# Altium PCB BD2_yd_V1.0.PcbDoc
Units mm, origin at the board's own origin, x right, y up, seen from the top; angles counter-clockwise.
Board outline 136.1 x 133.6 mm, 4 copper layers (Top Layer, Signal Layer 1, Signal Layer 2, Bottom Layer), stack 0.778 mm thick; 150 components, 91 nets, 496 pads, 199 vias.
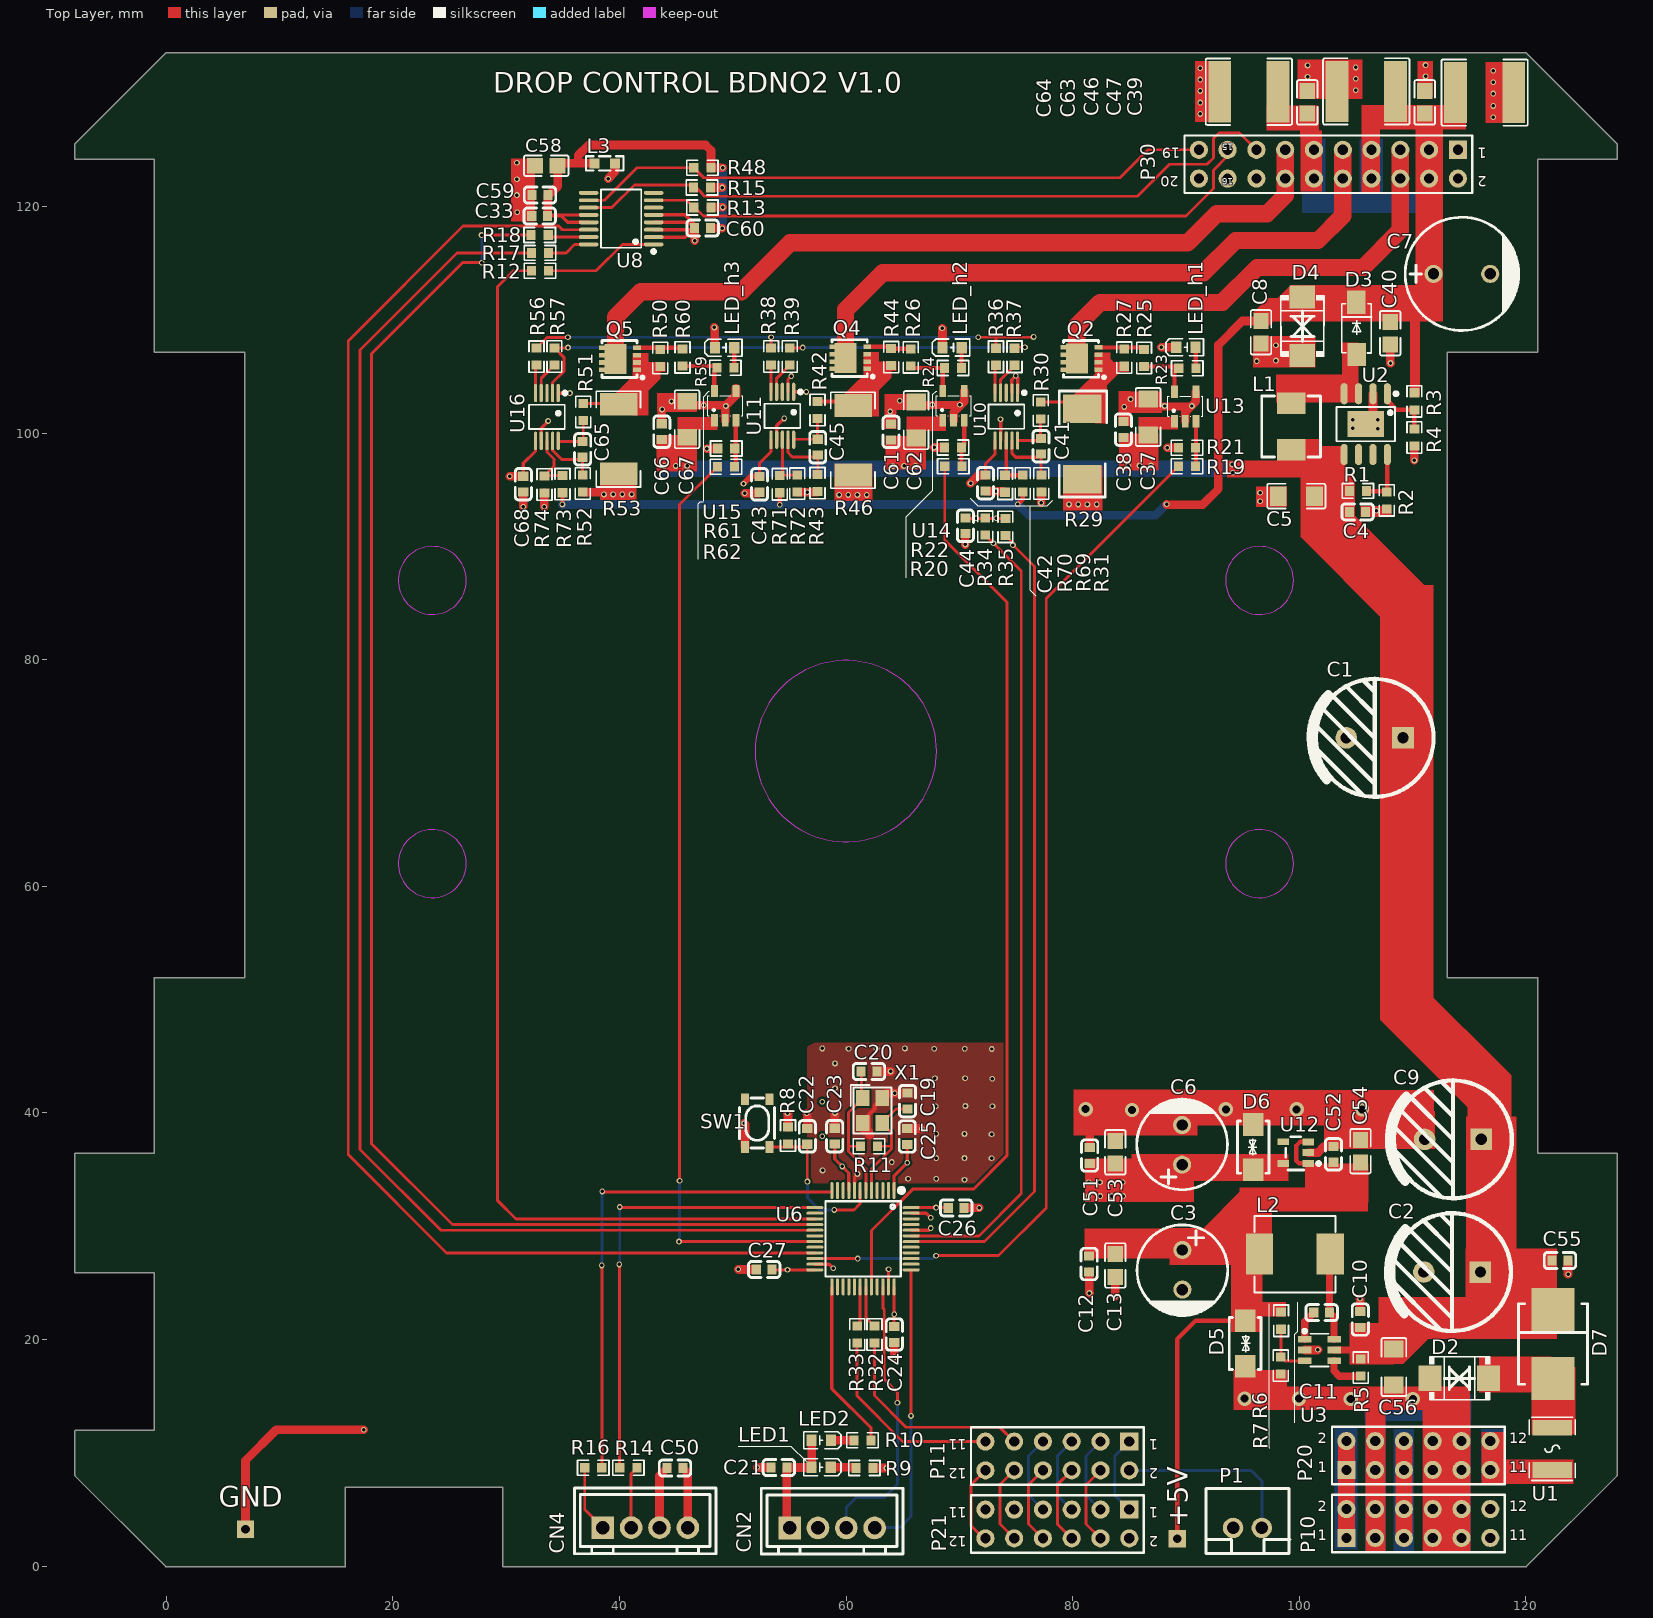
[diagram p0: Top Layer view]
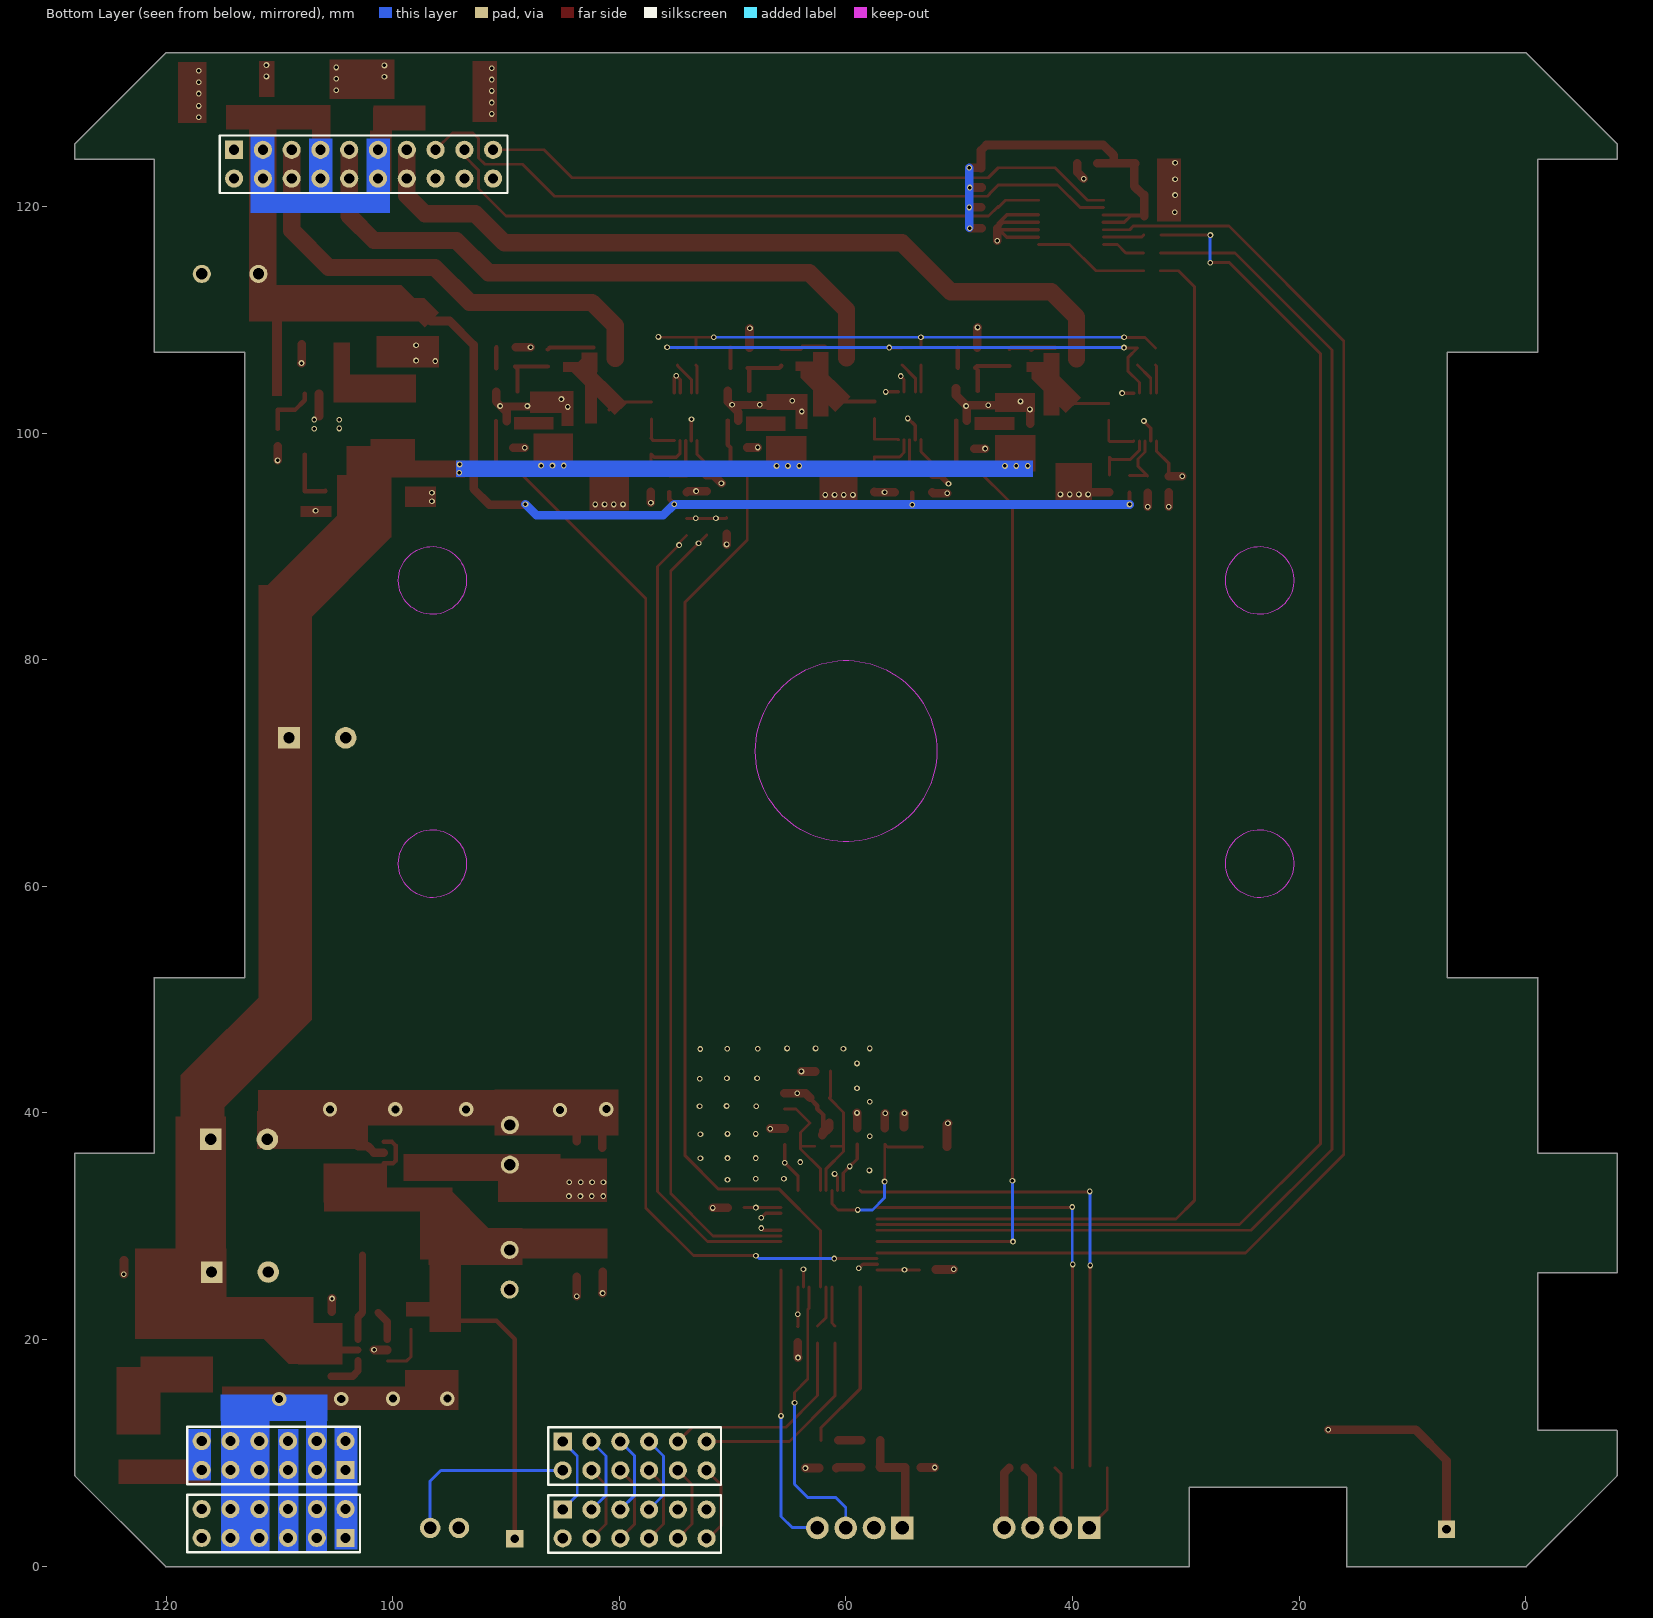
[diagram p1: Bottom Layer view, seen from below]
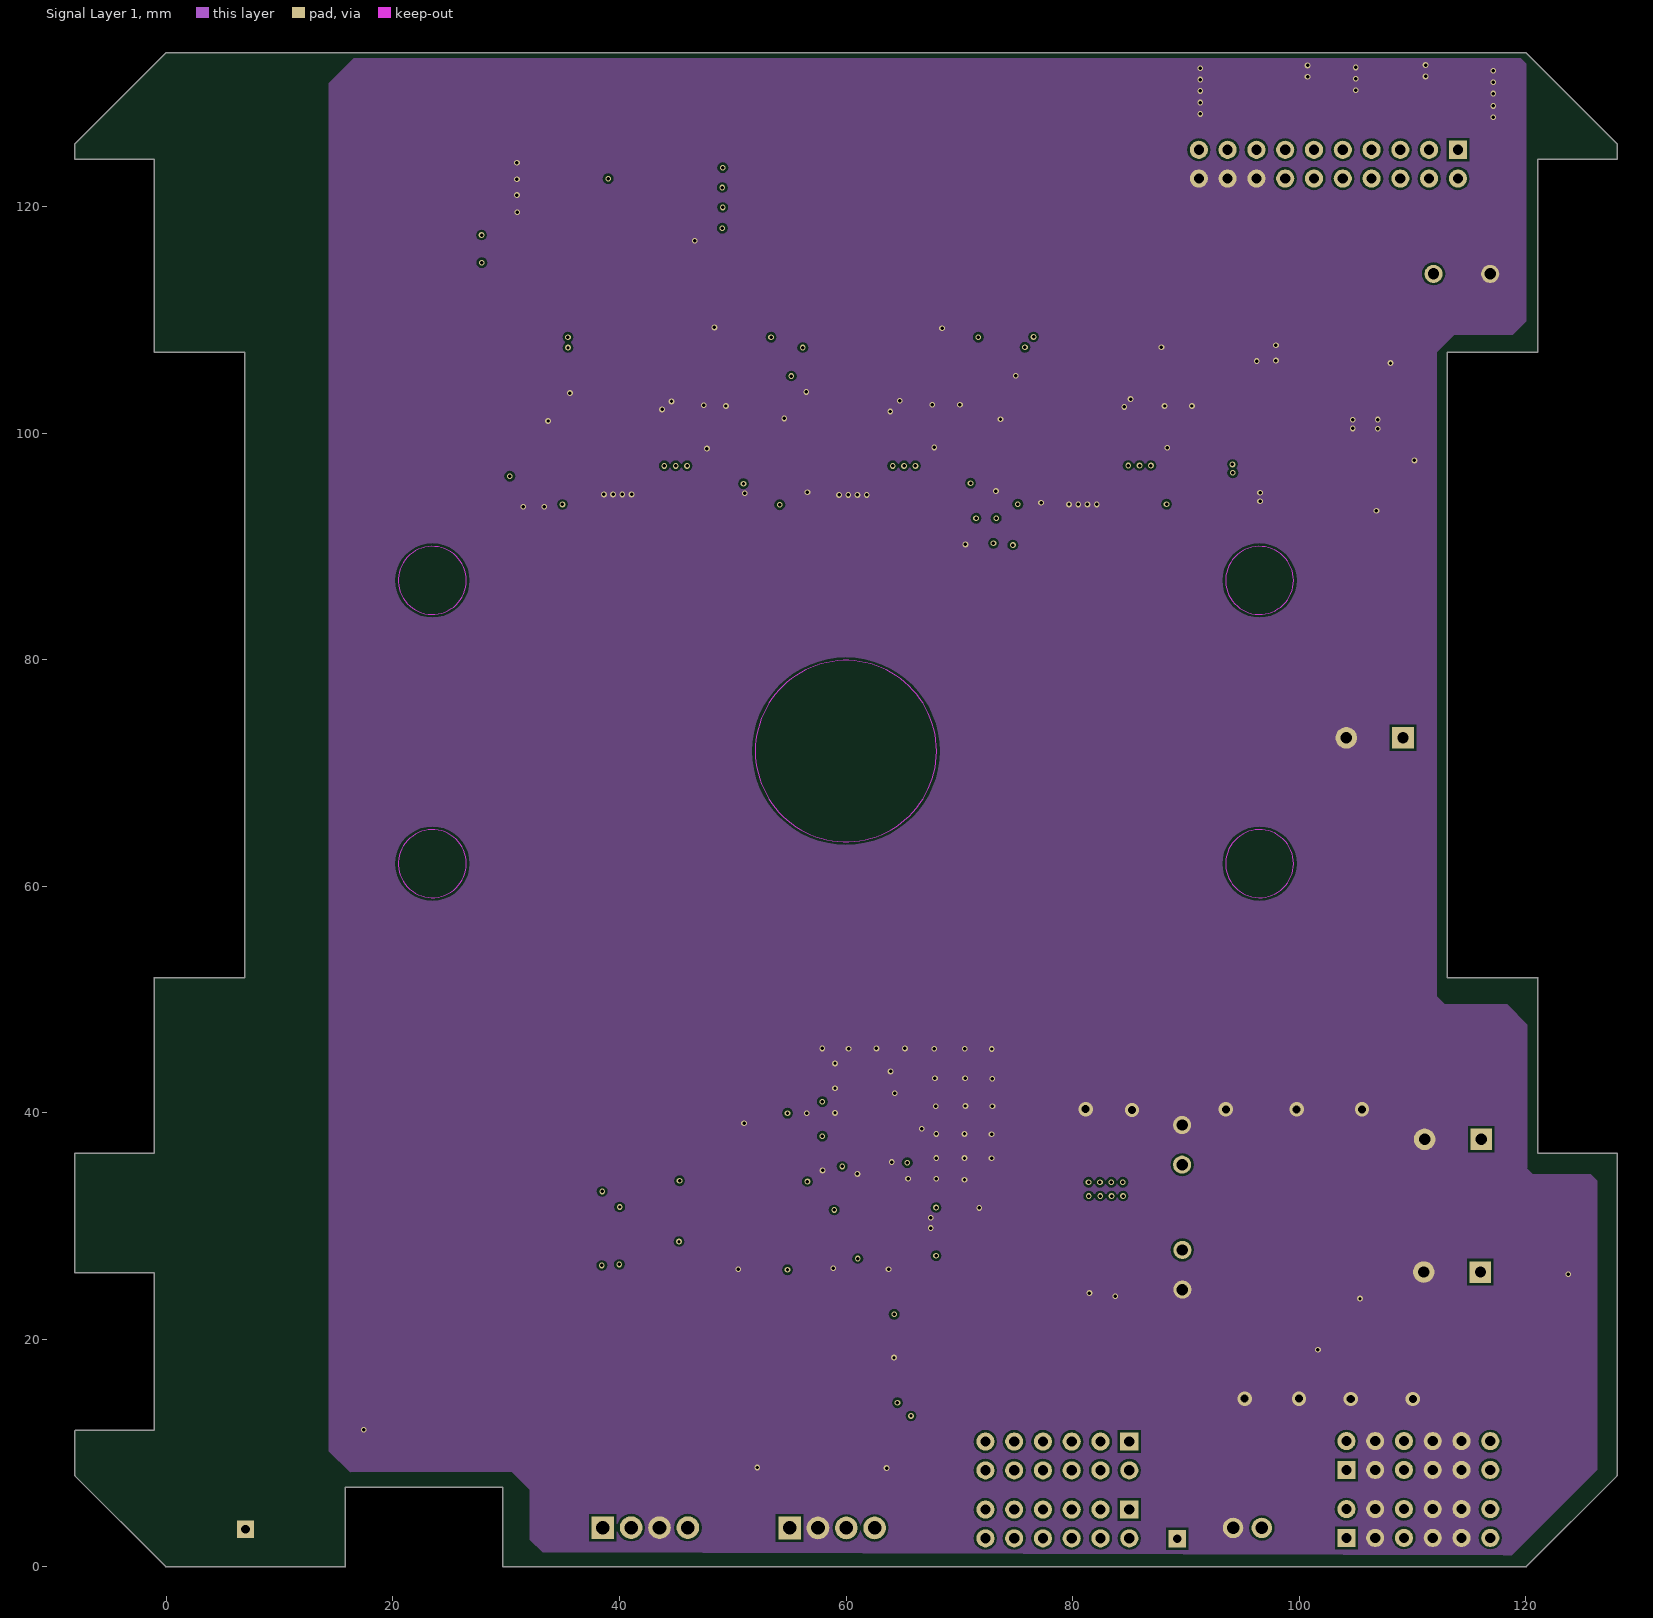
[diagram p2: Signal Layer 1]
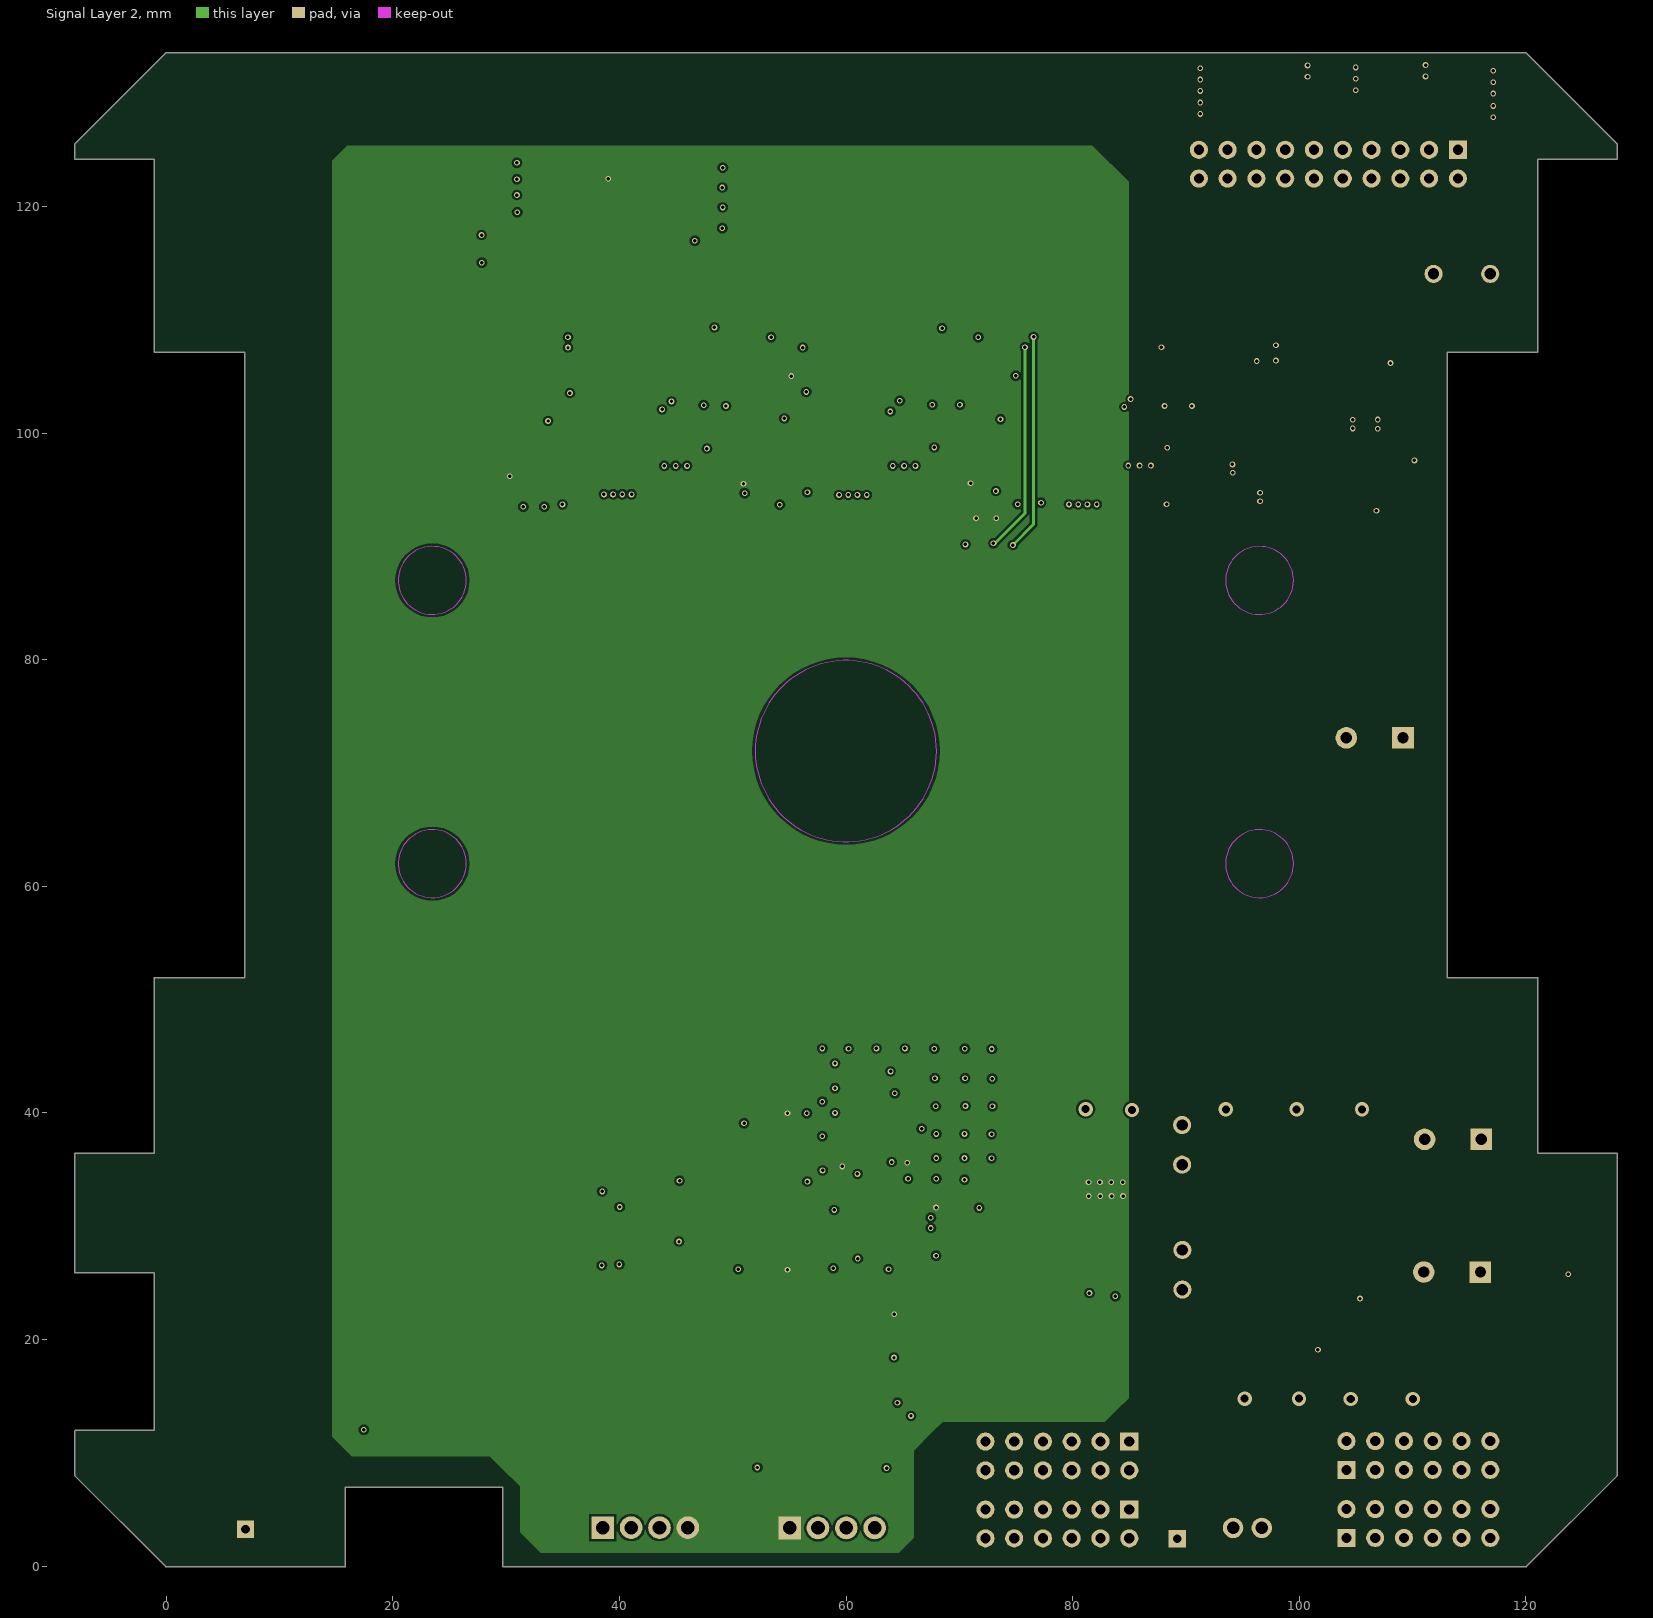
[diagram p3: Signal Layer 2]

## Layer stack, top to bottom
Top Layer: signal copper 0.0356
Dielectric: core 0.254, FR-4, Dk 4.2
Signal Layer 1: signal copper 0.036
Dielectric: prepreg 0.127, Dk 4.2
Signal Layer 2: signal copper 0.036
Dielectric: core 0.254, Dk 4.2
Bottom Layer: signal copper 0.0356

## Board outline
-8.05,8 ccw(c-8,8) -8.035,7.964 -0.036,-0.035 -0.036,-0.036 -0.036,-0.035 ccw(c0,0) 0,-0.05 15.773,-0.05 ccw(c15.773,0) 15.809,-0.036 ccw(c15.773,0) 15.824,0 15.824,6.95 29.723,6.95 29.723,0 ccw(c29.773,0) 29.773,-0.05 119.999,-0.05 ccw(c120,0) 120.036,-0.035 120.036,-0.036 128.036,7.964 128.035,7.964 ccw(c128,8) 128.05,8 128.05,36.4 ccw(c128,36.4) 128,36.45 121.05,36.45 121.05,51.9 ccw(c121,51.9) 121,51.95 113.05,51.95 113.05,107.15 121,107.15 ccw(c121,107.2) 121.05,107.2 121.05,124.15 128,124.15 ccw(c128,124.2) 128.05,124.2 128.05,125.5 ccw(c128,125.5) 128.035,125.536 128.036,125.536 120.036,133.536 120.036,133.535 ccw(c120,133.5) 120,133.55 0,133.55 ccw(c0,133.5) -0.036,133.535 -0.036,133.536 -0.036,133.535 -8.035,125.536 -8.036,125.536 -8.035,125.536 ccw(c-8,125.5) -8.05,125.5 -8.05,124.2 ccw(c-8,124.2) -8,124.15 -1.05,124.15 -1.05,107.2 ccw(c-1,107.2) -1,107.15 6.95,107.15 6.95,51.95 -1,51.95 ccw(c-1,51.9) -1.05,51.9 -1.05,36.45 -8,36.45 ccw(c-8,36.4) -8.05,36.4 -8.05,25.934 ccw(c-8,25.933) -8,25.883 -1.05,25.883 -1.05,11.984 -8,11.984 ccw(c-8,11.933) -8.05,11.933

## Design rules (kind name [scope] priority, off if disabled: settings)
Clearance Clearance_2 [InComponent('U4')] p1: gap=0.178
Clearance Clearance_4 [InComponent('U11')] p2: gap=0.178
Clearance Clearance_1 [InComponent('USB1')] p3: gap=0.152
Clearance Clearance_3 [InNetClass('HV Class')] p4: gap=0.7
Clearance [All] p5: gap=0.203
HoleSize [All] p1: absolutevalues=TRUE maxlimit=2539.975 minlimit=0.025 maxpercent=80.000 minpercent=20.000
MinimumSolderMaskSliver [All] p1: minsoldermaskwidth=0
PlaneConnect [InPadClass('All Pads')] p1: planeconnectstyle=Direct reliefexpansion=0.508 reliefentries=4 reliefconductorwidth=0.254 reliefairgap=0.254
PolygonConnect PolygonConnect_2 [IsVia] p1: connectstyle=Direct reliefconductorwidth=0.254 reliefentries=4 polygonreliefangle="90 Angle" airgapwidth=0.254
PolygonConnect PolygonConnect_1 [All vs InNet('GND')] p2: connectstyle=Direct reliefconductorwidth=0.254 reliefentries=4 polygonreliefangle="90 Angle" airgapwidth=0.254
PolygonConnect [All] p3: connectstyle=Direct reliefconductorwidth=0.254 reliefentries=4 polygonreliefangle="90 Angle" airgapwidth=0.254
RoutingVias RoutingVias_1 [All] p1: holewidth=0.305 width=0.508 viastyle="Through Hole" minholewidth=0.305 minwidth=0.508 maxholewidth=0.305 maxwidth=0.508
RoutingVias [All] p2: holewidth=0.305 width=2.54 viastyle="Through Hole" minholewidth=0.508 minwidth=2.54 maxholewidth=1.27 maxwidth=2.54
SilkToSilkClearance [All] p1: silktosilkclearance=0
SilkToSolderMaskClearance [IsPad] p1: minsilkscreentomaskgap=0 clearancetoexposedcopper=TRUE
SolderMaskExpansion [All] p1: expansion=0.102
Width [All] p1: maxlimit=5.08 minlimit=0.152 preferedwidth=0.254 minimp=50.000000 maximp=50.000000 favimp=50.000000
23 further rules are at their usual default settings.

## Classes and differential pairs
component class Connect: P1 P10 P11 P20 P21 P30

## Components (designator, comment, footprint, x,y, rotation, side; value= is the part's Value field where it differs from the comment)
C1 "220UF/50V" "CAP 5.0*10*12.5" 106.655,73.101 r180 top
C2 "220UF/50V" "CAP 5.0*10*12.5" 113.487,25.959 r180 top
C3 "470uF /16V" CAP-TH_BD8.0-P3.50-D0.6-FD 89.687,26.162 r270 top
C4 "100nF" C0603 105.15,93.044 r180 top
C5 "10uF" C1206 99.746,94.437 r0 top
C6 "470uF /16V" CAP-TH_BD8.0-P3.50-D0.6-FD 89.662,37.186 r90 top
C7 "220uF" CAP-TH_BD10.0-P5.00-D0.6-FD-A 114.351,114.046 r0 top
C8 "100nF" C0805 96.622,108.89 r90 top
C9 "220UF/50V" "CAP 5.0*10*12.5" 113.563,37.668 r180 top
C10 "100nF" C0603 105.385,21.768 r90 top
C11 "100nF" C0603 101.981,22.377 r180 top
C12 "100nF" C0603 81.458,26.67 r270 top
C13 "22uF" C0805 83.769,26.543 r90 top
C19 "20pF" C0603 65.43,41.046 r270 top
C20 "20pF" C0603 62.027,43.663 r180 top
C21 "100nF" C0603 54.077,8.712 r0 top
C22 "100nF" C0603 56.585,37.94 r90 top
C23 "100nF" C0603 59.004,37.948 r90 top
C24 "100nF" C0603 64.262,20.447 r270 top
C25 "100nF" C0603 65.405,37.922 r90 top
C26 "100nF" C0603 69.723,31.623 r0 top
C27 "100nF" C0603 52.781,26.187 r180 top
C33 "100nF" C0603 32.969,119.151 r0 top
C37 "10uF" C1206 86.665,101.422 r270 top
C38 "100nF" C0603 84.48,100.305 r270 top
C39 "10uF" C2220 116.357,130.048 r0 top
C40 "100nF" C0805 108.026,108.814 r90 top
C41 "100nF" C0603 77.203,98.835 r270 top
C42 "100nF" C0603 72.314,95.58 r270 top
C43 "100nF" C0603 52.375,95.479 r90 top
C44 "100nF" C0603 70.536,91.821 r270 top
C45 "100nF" C0603 57.506,98.755 r270 top
C46 "10uF" C2220 105.918,130.15 r180 top
C47 "100nF" C0805 111.074,129.184 r270 top
C50 "100nF" C0603 44.907,8.661 r180 top
C51 "100nF" C0603 81.509,36.246 r90 top
C52 "100nF" C0603 103.022,36.347 r90 top
C53 "22uF" C0805 83.769,36.525 r270 top
C54 "22uF" C0805 105.41,36.627 r270 top
C55 "100nF" C0603 123.012,26.975 r180 top
C56 "10uF" C1206 108.356,17.577 r90 top
C58 "22uF" C0805 33.553,123.596 r0 top
C59 "100nF" C0603 32.995,121.006 r180 top
C60 "100nF" C0603 47.346,118.085 r180 top
C61 "100nF" C0603 63.983,100.101 r270 top
C62 "10uF" C1206 66.192,101.143 r270 top
C63 "100nF" C0805 100.711,129.184 r270 top
C64 "10uF" C2220 95.555,130.124 r180 top
C65 "100nF" C0603 36.759,98.567 r270 top
C66 "100nF" C0603 43.743,100.123 r270 top
C67 "10uF" C1206 45.974,101.219 r270 top
C68 "100nF" C0603 31.524,95.488 r90 top
CN2 "WAFER-XH254Z-4A" CONN-TH_XH-4A 58.776,3.378 r0 top
CN4 "WAFER-XH254Z-4A" CONN-TH_XH-4A 42.291,3.404 r0 top
D2 "SMBJ15CA" SMB_L4.6-W3.6-LS5.4-BI 114.122,16.586 r0 top
D3 "SS310" SMA_L4.3-W2.6-LS5.0-FD 105.049,109.237 r90 top
D4 "SMBJ51CA" SMB_L4.4-W3.6-LS5.3-BI 100.279,109.423 r90 top
D5 "SMAJ5.0CA" SMA_L4.4-W2.6-LS5.0-BI 95.225,19.66 r90 top
D6 "SMAJ3.3CA" SMA_L4.4-W2.6-LS5.0-BI 95.936,36.982 r270 top
D7 "MBRS330T3" MBRS340 122.403,16.561 r90 top
L1 "10uH" IND-SMD_L5.4-W5.2_FXL0530 99.289,100.584 r270 top
L2 "15uH" IND-SMD_L7.0-W6.6_FXL0630 99.619,27.534 r180 top
L3 "BLM18PG121SN1D" "L 0603" 38.71,123.8 r180 top
LED1 "NCD0603G1" LED0603-RD_1 57.81,8.738 r180 top
LED2 "NCD0603G1" LED0603-RD_1 57.817,11.124 r180 top
LED_h1 "NCD0603G1" LED0603-RD_1 89.992,107.569 r0 top
LED_h2 "NCD0603G1" LED0603-RD_1 69.367,107.544 r0 top
LED_h3 "NCD0603G1" LED0603-RD_1 49.28,107.54 r0 top
P1 "Header 2H" CONN-TH_2P-P2.54_ZX-XH2.54-2PZZ-Y 95.428,3.378 r0 top
P10 "Header 6X2" HDR-6X2 104.16,2.5 r0 top
P11 "Header 6X2" HDR-6X2 85,11 r180 top locked
P20 "Header 6X2" HDR-6X2 104.16,8.5 r0 top locked
P21 "Header 6X2" HDR-6X2 85,5 r180 top locked
P30 "Header 10X2" HDR-10X2 114,125 r180 top
Q2 "DOZ30N10" POWERVDFN-8_L3.2-W3.1-P0.65-LS3.3-BL-1 80.734,106.582 r90 top
Q4 "DOZ30N10" POWERVDFN-8_L3.2-W3.1-P0.65-LS3.3-BL-1 60.325,106.633 r90 top
Q5 "DOZ30N10" POWERVDFN-8_L3.2-W3.1-P0.65-LS3.3-BL-1 40.009,106.553 r90 top
R1 "2kΩ" R0603 105.176,94.898 r180 top
R2 "1kΩ" R0603 107.716,94.06 r90 top
R3 "240kΩ" R0603 110.16,102.802 r90 top
R4 "6.2kΩ" R0603 110.16,99.601 r90 top
R5 "100kΩ" R0603 105.435,17.526 r90 top
R6 "110kΩ" R0603 98.4,21.666 r90 top
R7 "15kΩ" R0603 98.374,17.704 r90 top
R8 "10kΩ" R0603 54.877,38.001 r90 top
R9 "510Ω" R0603 61.62,8.661 r0 top
R10 "510Ω" R0603 61.455,11.105 r0 top
R11 "1MΩ" R0603 62.027,37.059 r0 top
R12 "47Ω" R0603 32.995,114.325 r0 top
R13 "100kΩ" R0603 47.32,119.913 r0 top
R14 "10Ω" R0603 40.792,8.687 r0 top
R15 "100kΩ" R0603 47.295,121.666 r0 top
R16 "10Ω" R0603 37.694,8.687 r180 top
R17 "47Ω" R0603 32.995,115.9 r180 top
R18 "47Ω" R0603 32.969,117.475 r180 top
R19 "330Ω" R0603 90.094,97.079 r0 top
R20 "330Ω" R0603 69.469,97.079 r0 top
R21 "10kΩ" R0603 90.094,98.704 r0 top
R22 "10kΩ" R0603 69.444,98.73 r0 top
R23 "2kΩ" R0603 90.119,105.715 r180 top
R24 "" R0603 69.444,105.74 r180 top
R25 "47Ω" R0603 86.309,106.629 r90 top
R26 "" R0603 65.71,106.68 r90 top
R27 "10kΩ" R0603 84.557,106.655 r90 top
R29 "820mΩ" RES-SMD_L6.4-W3.2-1 80.848,99.035 r90 top
R30 "10Ω" R0603 77.178,101.985 r270 top
R31 "10Ω" R0603 77.241,95.555 r90 top
R32 "10Ω" R0603 62.509,20.447 r90 top
R33 "10Ω" R0603 60.985,20.447 r90 top
R34 "4.7kΩ" R0603 72.288,91.745 r270 top
R35 "4.7kΩ" R0603 74.066,91.719 r270 top
R36 "47Ω" R0603 73.241,106.735 r90 top
R37 "47Ω" R0603 74.867,106.735 r90 top
R38 "47Ω" R0603 53.391,106.756 r270 top
R39 "47Ω" R0603 55.042,106.756 r270 top
R42 "" R0603 57.48,102.032 r90 top
R43 "" R0603 57.48,95.582 r270 top
R44 "10kΩ" R0603 63.983,106.705 r90 top
R46 "130mΩ" RES-SMD_L6.4-W3.2-R2512 60.655,99.365 r90 top
R48 "100kΩ" R0603 47.32,123.419 r0 top
R50 "10kΩ" R0603 43.616,106.626 r90 top
R51 "10Ω" R0603 36.81,101.869 r90 top
R52 "10Ω" R0603 36.759,95.544 r270 top
R53 "330mΩ" RES-SMD_L6.4-W3.2-R2512 39.959,99.463 r90 top
R56 "47Ω" R0603 32.691,106.748 r270 top
R57 "47Ω" R0603 34.265,106.756 r270 top
R59 "2kΩ" R0603 49.357,105.762 r180 top
R60 "47Ω" R0603 45.572,106.676 r90 top
R61 "10kΩ" R0603 49.431,98.631 r0 top
R62 "330Ω" R0603 49.411,97.03 r0 top
R69 "10kΩ" R0603 75.59,95.555 r270 top
R70 "10kΩ" R0603 74.041,95.529 r90 top
R71 "10kΩ" R0603 54.157,95.487 r270 top
R72 "10kΩ" R0603 55.706,95.537 r90 top
R73 "10kΩ" R0603 34.985,95.489 r270 top
R74 "10kΩ" R0603 33.385,95.464 r90 top
SW1 "SKRPACE010" KEY-SMD_4P-L4.2-W3.2-P2.20-LS4.6 52.165,39.108 r270 top
U1 "1812L300/24GR" F1812 122.326,10.363 r90 top
U2 "LGS6302EP" ESOP-8_L4.9-W3.9-P1.27-LS6.0-BL-EP-4 105.867,100.787 r180 top
U3 "MT2492" SOT-23-6_L2.9-W1.6-P0.95-LS2.8-BL_3 101.778,19.075 r270 top
U6 "STM32F103C8T6" LQFP-48_L7.0-W7.0-P0.50-LS9.0-BL 61.499,28.903 r180 top
U8 "ADS1220IPWR" TSSOP-16_L5.0-W4.4-P0.65-LS6.4-BL 40.157,118.923 r90 top
U10 "INA226AIDGSR" MSOP-10_L3.0-W3.0-P0.50-LS5.0-BL 74.143,101.448 r180 top
U11 "INA226AIDGSR" MSOP-10_L3.0-W3.0-P0.50-LS5.0-BL 54.381,101.524 r180 top
U12 "CJ6109B33M" SOT-23-5_L2.9-W1.6-P0.95-LS2.8-BR 99.695,36.5 r0 top
U13 "UCC27517DBVR" SOT-23-5_L3.0-W1.7-P0.95-LS2.8-BR 89.941,102.362 r270 top
U14 "UCC27517DBVR" SOT-23-5_L3.0-W1.7-P0.95-LS2.8-BR 69.494,102.413 r270 top
U15 "UCC27517DBVR" SOT-23-5_L3.0-W1.7-P0.95-LS2.8-BR 49.352,102.413 r270 top
U16 "INA226AIDGSR" MSOP-10_L3.0-W3.0-P0.50-LS5.0-BL 33.604,101.422 r180 top
X1 "8MHz" CRYSTAL-SMD_4P-L3.2-W2.5-BL 62.332,40.208 r270 top

## Footprints (in the part's own frame and the unit in brackets; to place one, negate y for a bottom-side part, rotate by r counter-clockwise, add the part's x,y. Pads: shape width x height; smd on the part's side, far side on the other; paste and mask are expansions set on the pad)
C0603 [mm]
  rect 0.8x0.9 smd: 1(-0.7,0) 2(0.7,0)
  silkscreen extent -1.39,-0.71 1.39,0.71
C0805 [mm]
  rect 1.41x1.35 smd paste-100 mask+0.051: 1(-1,0) 2(1,0)
  silkscreen extent -1.96,-0.9 1.96,0.9
C1206 [mm]
  rect 1.485x1.728 smd paste-100 mask+0.051: 1(-1.593,0) 2(1.593,0)
  silkscreen extent -2.56,-1.09 2.56,1.09
C2220 [mm]
  rect 2.01x5.4 smd paste-100 mask+0.051: 1(-2.58,0) 2(2.58,0)
  silkscreen extent -3.81,-2.93 3.81,2.93
"CAP 5.0*10*12.5" [mm]
  rect 1.9x1.9 hole 1: 1(-2.5,0)
  round 1.9 hole 1: 2(2.5,0)
  silkscreen extent -5.2,-5.21 5.64,5.2, body extent -5,-5.01 5.01,4.99, height 12.55
CAP-TH_BD8.0-P3.50-D0.6-FD [mm]
  round 1.6 hole 1: 1(-1.75,0) 2(1.75,0)
  silkscreen extent -3.96,-4 4.04,4
CAP-TH_BD10.0-P5.00-D0.6-FD-A [mm]
  round 1.6 hole 1: 1(-2.5,0) 2(2.5,0)
  silkscreen extent -5,-5 5.08,5
CONN-TH_2P-P2.54_ZX-XH2.54-2PZZ-Y [mm]
  round 1.8 hole 1.1 paste+0 mask+0.05: 1(1.27,0) 2(-1.27,0)
  silkscreen extent -3.67,-2.26 3.75,3.49
CONN-TH_XH-4A [mm]
  rect 2x2 hole 1.2: 1(-3.75,0)
  round 2 hole 1.2: 2(-1.25,0) 3(1.25,0) 4(3.75,0)
  silkscreen extent -6.25,-2.3 6.25,3.5
CRYSTAL-SMD_4P-L3.2-W2.5-BL [mm]
  rect 1.4x1.2 smd: 1(-1.1,-0.85) 2(1.1,-0.85) 3(1.1,0.85) 4(-1.1,0.85)
  silkscreen extent -2.26,-1.91 2.03,1.68
ESOP-8_L4.9-W3.9-P1.27-LS6.0-BL-EP-4 [mm]
  oval 0.63x1.865 smd: 1(-1.905,-2.682) 2(-0.635,-2.682) 3(0.635,-2.682) 4(1.905,-2.682) 5(1.905,2.682) 6(0.635,2.682) 7(-0.635,2.682) 8(-1.905,2.682)
  rect 3.2x2.3 smd paste+0 mask+0.05: 9(0,0)
  silkscreen extent -2.82,-2.83 2.58,1.52
F1812 [mm]
  rect 1.407x3.499 smd paste-100 mask+0.051: 1(-1.853,0) 2(1.853,0)
  silkscreen extent -2.79,-2.03 2.79,2.03
HDR-6X2 [mm]
  rect 1.6x1.6 hole 0.9: 1(0,0)
  round 1.6 hole 0.9: 2(0,2.54) 3(2.54,0) 4(2.54,2.54) 5(5.08,0) 6(5.08,2.54) 7(7.62,0) 8(7.62,2.54) 9(10.16,0) 10(10.16,2.54) 11(12.7,0) 12(12.7,2.54)
  silkscreen extent -1.27,-1.27 13.97,3.81, body extent -1.27,-1.27 13.97,3.81, height 8.5
HDR-10X2 [mm]
  rect 1.6x1.6 hole 0.9: 1(0,0)
  round 1.6 hole 0.9: 2(0,2.54) 3(2.54,0) 4(2.54,2.54) 5(5.08,0) 6(5.08,2.54) 7(7.62,0) 8(7.62,2.54) 9(10.16,0) 10(10.16,2.54) 11(12.7,0) 12(12.7,2.54) 13(15.24,0) 14(15.24,2.54) 15(17.78,0) 16(17.78,2.54) 17(20.32,0) 18(20.32,2.54) 19(22.86,0) 20(22.86,2.54)
  silkscreen extent -1.27,-1.27 24.13,3.81, body extent -1.27,-1.27 24.13,3.81, height 8.5
IND-SMD_L5.4-W5.2_FXL0530 [mm]
  rect 1.9x2.5 smd: 1(-2.05,0) 2(2.05,0)
  silkscreen extent -2.7,-2.6 2.7,2.6
IND-SMD_L7.0-W6.6_FXL0630 [mm]
  rect 2.424x3.62 smd: 1(3.128,0) 2(-3.128,0)
  silkscreen extent -3.58,-3.38 3.58,3.38
KEY-SMD_4P-L4.2-W3.2-P2.20-LS4.6 [mm]
  rect 1.05x0.7 smd: 1(-2.1,1.075) 2(2.1,1.075) 3(-2.1,-1.075) 4(2.1,-1.075)
  silkscreen extent -2.2,-1.55 2.2,1.52
"L 0603" [mil] "С?"
  rect 35x35 smd: 1(-35,0) 2(35,0)
  silkscreen extent -65,-25 65,25, body extent -31,-16 31,16, height 31
LED0603-RD_1 [mm]
  rect 0.9x1 smd: 1(-0.85,0) 2(0.85,0)
  silkscreen extent -1.75,-0.75 1.55,0.75
LQFP-48_L7.0-W7.0-P0.50-LS9.0-BL [mm]
  oval 0.27x1.5 smd paste+0 mask+0.05: 1(-2.75,-4.25) 2(-2.25,-4.25) 3(-1.75,-4.25) 4(-1.25,-4.25) 5(-0.75,-4.25) 6(-0.25,-4.25) 7(0.25,-4.25) 8(0.75,-4.25) 9(1.25,-4.25) 10(1.75,-4.25) 11(2.25,-4.25) 12(2.75,-4.25) 25(2.75,4.25) 26(2.25,4.25) 27(1.75,4.25) 28(1.25,4.25) 29(0.75,4.25) 30(0.25,4.25) 31(-0.25,4.25) 32(-0.75,4.25) 33(-1.25,4.25) 34(-1.75,4.25) 35(-2.25,4.25) 36(-2.75,4.25)
  oval 1.5x0.27 smd paste+0 mask+0.05: 13(4.25,-2.75) 14(4.25,-2.25) 15(4.25,-1.75) 16(4.25,-1.25) 17(4.25,-0.75) 18(4.25,-0.25) 19(4.25,0.25) 20(4.25,0.75) 21(4.25,1.25) 22(4.25,1.75) 23(4.25,2.25) 24(4.25,2.75) 37(-4.25,2.75) 38(-4.25,2.25) 39(-4.25,1.75) 40(-4.25,1.25) 41(-4.25,0.75) 42(-4.25,0.25) 43(-4.25,-0.25) 44(-4.25,-0.75) 45(-4.25,-1.25) 46(-4.25,-1.75) 47(-4.25,-2.25) 48(-4.25,-2.75)
  silkscreen extent -3.59,-4.46 3.3,3.34
MBRS340 [mil]
  rect 150x150 smd: 1(0,0) 2(240,0)
  silkscreen extent -20,-120 260,120
MSOP-10_L3.0-W3.0-P0.50-LS5.0-BL [mm]
  oval 0.28x1.62 smd: 1(-1,-2.11) 2(-0.5,-2.11) 3(0,-2.11) 4(0.5,-2.11) 5(1,-2.11) 6(1,2.11) 7(0.5,2.11) 8(0,2.11) 9(-0.5,2.11) 10(-1,2.11)
  silkscreen extent -1.74,-2.26 1.58,1.07
POWERVDFN-8_L3.2-W3.1-P0.65-LS3.3-BL-1 [mm]
  rect 0.4x0.7 smd paste-100 mask+0.05: 1(-0.975,-1.55) 2(-0.325,-1.55) 3(0.325,-1.55) 4(0.975,-1.55)
  rect 0.4x0.5 smd paste-100 mask+0.05: 5(0.975,1.55) 6(0.325,1.55) 7(-0.325,1.55) 8(-0.975,1.55)
  rect 2.65x1.94 smd paste-100 mask+0.05: 8(0,0.36)
  silkscreen extent -1.78,-2.16 1.6,1.55
R0603 [mm]
  rect 0.806x0.864 smd paste-100 mask+0.051: 1(-0.753,0) 2(0.753,0)
  silkscreen extent -1.39,-0.66 1.39,0.66
RES-SMD_L6.4-W3.2-1 [mm]
  rect 2.5x3.4 smd: 1(-3.1,0) 2(3.1,0)
  silkscreen extent -4.69,-2.16 4.69,2.03
RES-SMD_L6.4-W3.2-R2512 [mm]
  rect 2x3.3 smd: 1(-3.066,0) 2(3.066,0)
  silkscreen extent -4.23,-1.91 4.23,2.01
SMA_L4.3-W2.6-LS5.0-FD [mm]
  rect 2.046x1.62 smd: 1(-2.304,-0.009) 2(2.304,0.009)
  silkscreen extent -2.17,-1.32 2.19,1.29
SMA_L4.4-W2.6-LS5.0-BI [mm]
  rect 2x1.8 smd: 1(-2,0) 2(2,0)
  silkscreen extent -2.3,-1.4 2.3,1.4
SMB_L4.4-W3.6-LS5.3-BI [mm]
  rect 2.047x2.241 smd: 1(-2.591,0) 2(2.591,0)
  silkscreen extent -2.67,-1.91 2.74,1.91
SMB_L4.6-W3.6-LS5.4-BI [mm]
  rect 2.047x2.241 smd: 1(-2.591,0) 2(2.591,0)
  silkscreen extent -2.67,-1.91 2.74,1.91
SOT-23-5_L2.9-W1.6-P0.95-LS2.8-BR [mm]
  rect 1x0.6 smd paste+0 mask+0.05: 1(1.1,-0.95) 2(1.1,0) 3(1.1,0.95) 4(-1.1,0.95) 5(-1.1,-0.95)
  silkscreen extent -0.89,-1.52 2.16,1.4
SOT-23-5_L3.0-W1.7-P0.95-LS2.8-BR [mm]
  rect 1.1x0.6 smd paste+0.051: 1(1.3,-0.95) 2(1.3,0) 3(1.3,0.95) 4(-1.3,0.95) 5(-1.3,-0.95)
  silkscreen extent -0.9,-1.55 0.9,1.55
SOT-23-6_L2.9-W1.6-P0.95-LS2.8-BL_3 [mm]
  rect 0.6x1.2 smd: 1(-0.95,-1.3) 2(0,-1.3) 3(0.95,-1.3) 4(0.95,1.3) 5(0,1.3) 6(-0.95,1.3)
  silkscreen extent -1.82,-1.45 1.45,0.8
TSSOP-16_L5.0-W4.4-P0.65-LS6.4-BL [mm]
  oval 0.343x1.731 smd: 1(-2.275,-2.866) 2(-1.625,-2.866) 3(-0.975,-2.866) 4(-0.325,-2.866) 5(0.325,-2.866) 6(0.975,-2.866) 7(1.625,-2.866) 8(2.275,-2.866) 9(2.275,2.866) 10(1.625,2.866) 11(0.975,2.866) 12(0.325,2.866) 13(-0.325,2.866) 14(-0.975,2.866) 15(-1.625,2.866) 16(-2.275,2.866)
  silkscreen extent -3.05,-3.02 2.58,1.77

## Part data
C1 C2 C9: library part C-CAP, "直插电解电容"
C3 C6: library part "JBLE2471M016D090RLM 470UF 16V"
C4 C10 C11 C12 C21 C22 C23 C24 C25 C26 C27 C33 C38 C41 C42 C43 C44 C45 C50 C51 C52 C55 C59 C60 C61 C65 C66 C68: library part CGA0603X7R104K500JT
C5 C37 C56 C62 C67: library part CL31B106KBHNNNE
C7: library part 2210631013R00
C8 C40 C47 C63: library part CL21B104KCFNNNE
C13 C53 C54 C58: library part FCC0805X226M250FT
C19 C20: library part CL10C200JB8NNNC
C39 C46 C64: library part FS55X106K101EGG
D2: library part SMBJ15CA_C19077570
D3: library part SS310_C7420364
D4: library part SMBJ51CA_C41376101
D5: library part SMAJ5.0CA_C83324
D6: library part SMAJ3.3CA_C2959732
D7: library part "DIODE SCHOTTKY", "Schottky Diode"
L1: library part FXL0530-100-M
L2: library part FXL0630-150-M
P1: "Header, 2-Pin, Right Angle"
P10 P11 P20 P21: "Header, 6-Pin, Dual row"
P30: "Header, 10-Pin, Dual row"
R1 R23 R24 R59: library part 0603WAF2001T5E
R2: library part 0603WAF1001T5E
R3: library part 0603WAF2403T5E
R4 R14 R16 R32 R33: library part 0603WAF6201T5E
R5 R13 R15 R48: library part RT0603BRD07100KL
R6: library part FRC0603F1103TS
R7: library part FRC0603F1502TS
R8 R21 R22 R27 R44 R50 R61 R69 R70 R71 R72 R73 R74: library part 0603WAF1002T5E
R9 R10: library part 0603WAF5100T5E
R11: library part 0603WAF1004T5E
R12 R17 R18 R25 R26 R36 R37 R38 R39 R56 R57 R60: library part 0603WAF470JT5E
R19 R20 R62: library part "FRC0603J331 TS"
R29: library part RLP25FEER400
R30 R31 R42 R43 R51 R52: library part 0603WAF100JT5E
R34 R35: library part 0603WAF4701T5E
R46 R53: library part FRM252WFR100TN
X1: library part X32258MSB4SI

## Free pads (board coordinates)
  rect 1.524x1.524 hole 0.762: 0(7.01,3.251) 0(89.23,2.413)

## Via types
v1: diameter 0.508, hole 0.305, Top Layer to Bottom Layer, 128 vias
v2: diameter 0.508, hole 0.308, Top Layer to Bottom Layer, 62 vias
v3: diameter 1.27, hole 0.711, Top Layer to Bottom Layer, 9 vias

## Nets (pads, with @x,y where several pads share a name; then routed paths per layer and width w, separated by ;. In a path a pad name is that pad's centre, name@x,y a point inside that pad or via, vN(x,y) a via of type N, cw(c..) or ccw(c..) an arc to the next point about the centre after c; other vN are vias at no path point)
+3.3V: C6.1 C21.2 C23.1 C24.1 C25.1 C26.1 C27.1 C42.1 C43.2 C44.1 C50.1 C51.1 C53.2 C68.2 CN2.1 CN4.4 D6.2 L3.1 LED1.2 LED2.2 R8.2 R34.1 R35.1 U6.1 U6.9 U6.24 U6.36 U6.48 U10.6 U11.2 U11.6 U12.5 U16.6 | length 58.5
  Top Layer w0.279: C68.2 31.524,97.335 32.604,98.416 U16.6 ; C43.2 52.375,97.358 53.381,98.365 U11.6 ; C27.1@53.516,26.153 v1(54.839,26.153) U6.24 ; U11.2 54.881,104.741 v1(55.169,105.029) ; C23.1 59.004,35.941 v1(59.665,35.281) 60.249,34.696 U6.9 ; U6.36 v1(64.249,22.225) 64.249,21.16 C24.1 ; U6.1 64.249,34.455 v1(65.405,35.611) C25.1 ; U6.48 v1(67.945,31.653) C26.1@68.993,31.653 ; C44.1 70.584,92.473 v1@71.476,92.473 ; v1(71.476,92.481) v1@71.476,92.473 ; C42.1 72.314,97.282 73.143,98.111 U10.6 ; v1(73.254,92.481) v1@73.254,92.473 ; R35.1 v1@73.254,92.473 ; v1@71.476,92.473 v1@73.254,92.473
  Top Layer w0.508: v1(50.952,95.529) 51.602,96.179 C43.2
  Top Layer w0.762: v1(30.328,96.19) 30.329,96.188 C68.2 ; v1(39.014,122.453) 39.599,123.038 L3.1 ; C50.1 46.041,8.228 CN4.4 ; v1(54.839,39.98) 54.877,39.941 R8.2 ; CN2.1@55.042,3.175 54.777,3.44 C21.2 56.947,8.712 LED1.2@56.967,8.732 ; LED2.2 LED1.2@56.967,8.732 ; v1(70.993,95.58) 71.693,96.28 C42.1 ; LED1.2@56.967,8.732 56.967,8.707 LED1.2 56.998,8.763 LED1.2@56.967,8.732
  other v2: 81.432,32.664 82.436,32.664 83.439,32.664 84.455,32.664 81.407,33.884 82.41,33.884 83.414,33.884 84.43,33.884
+3.3V_A: C33.2 C58.2 C59.1 C60.1 L3.2 R13.2 R15.2 R48.2 U8.12 U8.13 | length 40.2
  Top Layer w0.279: C33.2@33.604,119.177 33.669,119.177 34.849,119.177 35.428,118.598 U8.13 ; C33.2 33.706,119.431 33.889,119.248 U8.12
  Top Layer w0.762: C33.2 33.669,119.177 33.669,120.969 C59.1@33.706,121.006 ; C59.1 33.731,120.955 34.553,121.777 C58.2 ; C58.2@34.468,123.774 34.493,123.8 36.373,123.8 ; L3.2 36.373,123.8 ; C60.1@48.037,118.085 C60.1 v1(49.087,118.085) ; R15.2@48.04,121.666 R15.2 v1(49.09,121.666) ; R13.2@48.065,119.913 R13.2 v1(49.115,119.913) ; R48.2 R48.2@48.082,123.419 ; R48.2@48.082,123.368 R48.2@48.082,123.419 ; v1(49.124,123.419) R48.2@48.082,123.419 ; 36.373,123.8 36.373,124.511 37.287,125.425 47.6,125.425 48.082,124.943 R48.2@48.082,123.419
  Bottom Layer w0.762: v1@49.124,118.121 v1(49.124,123.419)
+5V: C3.1 C12.1 C13.2 C52.1 C54.2 D5.2 L2.1 pad.0@89.23,2.413 R6.2 U12.1 U12.3 | length 28
  Top Layer w0.381: pad.0@89.23,2.413 89.23,20.041 90.849,21.66 D5.2 ; U12.1 99.984,35.55 99.746,35.789 99.746,37.135 100.061,37.45 U12.3
+12V: C1.1 C2.1 C4.2 C5.2 C9.1 C10.1 C37.2 C38.2 C55.2 C56.2 C61.2 C62.2 C66.2 C67.2 D7.2 L1.2 R1.2 R5.2 U2.5 U3.5 U13.1 U14.1 U15.1 | length 76.1
  Top Layer w0.635: U3.5 104.572,19.075 104.597,19.101
  Top Layer w1.27: C5.2 101.338,90.965 109.499,82.804 109.499,46.761 115.987,40.274 C2.1
  other v2: 94.132,96.495 43.967,97.104 44.971,97.104 45.974,97.104 64.122,97.104 65.126,97.104 66.129,97.104 84.9,97.13 85.903,97.13 86.906,97.13 94.107,97.231
+48V: C7.1 C8.2 C39.1 C40.2 C46.1 C47.2 C63.2 C64.1 D3.2 D4.2 P30.3 P30.4 P30.7 P30.8 P30.11 P30.12 R3.2 R69.2 R71.2 R73.2 | length 80
  Top Layer w0.381: v1(34.976,93.701) 34.985,93.71 R73.2 ; v1(54.153,93.675) 54.157,93.679 R71.2 ; v1(75.159,93.726) 75.59,94.158 R69.2
  Top Layer w0.762: v1(88.29,93.726) 88.29,93.701 88.316,93.675 91.465,93.675 92.862,95.072 92.862,107.772 94.98,109.89 C8.2
  Bottom Layer w0.762: v1(34.976,93.701) 75.133,93.701 v1(75.159,93.726) 76.124,92.761 87.325,92.761 v1(88.29,93.726)
D1: P30.5 P30.6 Q2.5 Q2.6 Q2.7 Q2.8 | length 42
  Top Layer w1.524: Q2.8@80.374,106.582 80.374,109.474 82.431,111.531 93.218,111.531 96.291,114.605 105.639,114.605 108.92,117.886 P30.6 P30.5
D2: P30.9 P30.10 Q4.5 Q4.6 Q4.7 Q4.8 | length 57.4
  Top Layer w1.524: Q4.8@59.965,106.633 59.965,110.871 63.242,114.148 91.542,114.148 94.386,116.992 101.651,116.992 103.84,119.182 P30.10 P30.9
D3: P30.13 P30.14 Q5.5 Q5.6 Q5.7 Q5.8 | length 71.3
  Top Layer w1.524: Q5.8@39.649,106.553 39.649,110.236 41.885,112.471 50.749,112.471 55.067,116.789 90.145,116.789 92.71,119.355 97.155,119.355 98.76,120.96 P30.14 P30.13
GND: C1.2 C2.2 C3.2 C4.1 C5.1 C6.2 C7.2 C8.1 C9.2 C10.2 C12.2 C13.1 C19.1 C20.1 C21.1 C22.2 C23.2 C24.2 C25.2 C26.2 C27.2 C33.1 C37.1 C38.1 C39.2 C40.1 C42.2 C43.1 C44.2 C46.2 C47.1 C50.2 C51.2 C52.2 C53.1 C54.1 C55.1 C56.1 C58.1 C59.2 C60.2 C61.1 C62.1 C63.1 C64.2 C66.1 C67.1 C68.1 CN2.2 CN4.3 D2.1 D4.1 D5.1 D6.1 LED_h1.1 LED_h2.1 LED_h3.1 P1.2 P10.3 P10.4 P10.7 P10.8 P10.9 P10.10 P20.3 P20.4 P20.7 P20.8 P20.9 P20.10 P30.16 P30.18 P30.20 pad.0@7.01,3.251 R2.1 R4.1 R7.1 R9.2 R21.1 R22.1 R29.1 R31.1 R43.2 R46.1 R52.2 R53.1 R61.1 R70.1 R72.1 R74.1 SW1.4 U2.2 U2.9 U3.2 U6.8 U6.23 U6.35 U6.44 U6.47 U8.2 U8.3 U8.4 U8.5 U10.1 U10.2 U10.7 U11.1 U11.7 U12.2 U13.2 U13.4 U14.2 U14.4 U15.2 U15.4 U16.1 U16.7 X1.2 X1.4 | length 158.4
  Top Layer w0.279: U6.23 58.513,26.653 v1(58.877,26.289) ; U6.8 60.749,34.359 v1(61.011,34.62) ; U6.35 63.749,26.208 v1(63.754,26.213) ; U6.44 67.296,29.653 v1(67.488,29.845) ; U6.47 67.094,31.153 v1(67.488,30.759)
  Top Layer w0.305: U16.7 33.104,100.439 33.718,101.054 v1(33.706,101.067) ; U16.1 35.638,103.532 v1(35.64,103.53) ; U8.2 45.822,117.298 C60.2@46.472,117.948 ; U8.3 C60.2@46.472,117.948 ; U8.4 46.121,118.598 C60.2@46.584,118.135 ; U8.5 45.801,119.248 46.584,118.466 C60.2@46.584,118.135 ; C60.2@46.634,118.11 C60.2@46.472,117.948 ; C60.2@46.66,118.059 46.646,118.045 46.548,117.948 C60.2@46.472,117.948 ; U11.7 53.881,100.668 54.534,101.321 v1(54.559,101.295) ; U11.1 56.488,103.634 v1(56.49,103.632) ; v1(73.635,101.219) 73.642,101.211 U10.7 ; U10.2 74.642,104.716 v1(74.981,105.054) 75.143,104.893 U10.1 ; C60.2@46.584,118.135 46.584,118.11 C60.2 C60.2@46.584,118.135
  Top Layer w0.381: 61.997,38.405 61.997,39.823 62.535,40.361 62.535,40.64 X1.4@63.144,41.25
  Top Layer w0.762: pad.0@7.01,3.251 7.01,9.322 9.728,12.04 v2(17.45,12.04) ; v1(31.521,93.497) 31.524,93.5 C68.1 ; v1(33.376,93.497) 33.385,93.507 R74.1 ; R52.2 38.864,94.791 ; CN4.3 43.541,7.995 C50.2 ; C66.1 43.743,102.062 v1(43.764,102.083) ; v1(44.602,102.794) 44.62,102.812 C67.1 ; C60.2 46.646,118.045 46.646,116.981 v1(46.66,116.967) ; v1(47.727,98.628) 47.729,98.631 R61.1 ; v1(48.387,109.322) 48.43,109.278 LED_h3.1 ; U15.2 v1@49.352,102.387 ; v1(49.403,102.387) v1@49.352,102.387 ; U15.4@50.292,103.962 50.292,103.327 v1@49.352,102.387 ; v1(50.495,26.213) 50.521,26.187 C27.2 ; v1(51.003,39.091) 51.09,39.004 SW1.4 ; v1(51.054,94.691) 52.287,94.691 C43.1 ; v1(52.172,8.712) C21.1 ; R72.1 v1@56.591,94.784 ; v1(56.54,39.98) 56.585,39.935 C22.2 ; v1(56.591,94.767) v1@56.591,94.784 ; R43.2@57.506,94.818 57.472,94.784 v1@56.591,94.784 ; C23.2 59.004,39.954 59.03,39.98 v1(59.03,40.005) ; X1.2 61.482,38.682 62.111,38.052 61.997,38.166 61.997,38.405 ; R9.2 v1(63.576,8.661) ; C20.1 v1(63.932,43.663) ; X1.4@63.17,41.351 63.565,41.746 v1@64.313,41.746 ; v1(64.237,18.415) 64.262,18.44 C24.2 ; v1(64.313,41.732) v1@64.313,41.746 ; C25.2 66.661,38.622 v1(66.675,38.608) ; C19.1 v1@64.313,41.746 ; v1(67.793,98.73) R22.1 ; v1(68.478,109.245) 68.517,109.206 LED_h2.1 ; U14.2 69.494,101.839 70.434,102.779 U14.4@70.434,103.708 ; C26.2 v1(71.755,31.623) ; v1(70.536,90.17) C44.2 ; C42.2 v1(73.228,94.88) 73.937,94.88 R70.1 ; v1(77.216,93.853) 77.241,93.878 R31.1 ; C12.2 81.458,24.079 v1(81.483,24.105) ; C51.2 81.509,38.354 ; v1(83.769,23.825) C13.1 ; C53.1 83.769,38.964 ; v1(87.833,107.569) LED_h1.1 ; v1(88.341,98.704) R21.1 ; U13.2 89.941,101.854 90.881,102.794 U13.4@90.881,103.632 ; U3.2 101.625,19.075 v1(101.651,19.101) ; U12.2 101.651,36.5 102.21,37.059 103.048,37.059 103.657,37.668 C54.1@105.41,37.668 ; v1(105.359,23.622) 105.385,23.597 C10.2 ; U2.9@106.502,101.473 U2.2 ; C40.1 108.026,106.172 v1(108.052,106.172) ; v1(110.16,97.587) R4.1 ; C55.1 123.712,25.792 v1(123.749,25.756)
  Top Layer w1.524: P10.3 P20.4 ; P10.7 P20.8 ; P10.9 P20.10
  other v1: 70.46,34.112 65.481,34.188 67.97,34.188 57.937,34.925 64.033,35.662 72.847,35.992 67.97,36.017 70.46,36.017 72.847,38.125 67.97,38.151 70.46,38.151 67.92,40.589 72.923,40.589 70.536,40.615 59.03,42.189 72.898,43.028 67.843,43.053 70.51,43.053 59.03,44.374 72.873,45.644 60.223,45.669 67.793,45.669 70.485,45.669 57.912,45.695 62.687,45.695 65.202,45.695 106.807,93.142 63.906,101.905 84.557,102.311 88.113,102.387 90.526,102.387 47.447,102.464 67.615,102.489 70.053,102.489 64.745,102.845 85.115,102.997
  other v2: 79.68,93.701 80.493,93.701 81.305,93.701 82.118,93.701 96.545,93.98 59.385,94.539 60.198,94.539 61.011,94.539 61.824,94.539 38.633,94.59 39.446,94.59 40.259,94.59 41.072,94.59 96.545,94.742 106.934,100.381 104.724,100.406 104.724,101.168 106.934,101.194 96.241,106.35 97.942,106.401 97.942,107.747 30.988,119.482 30.963,121.006 30.963,122.403 30.963,123.85 117.119,127.864 91.262,128.168 117.119,128.867 91.262,129.172 117.119,129.959 91.262,130.188 104.978,130.264 117.119,130.962 91.262,131.191 104.978,131.267 100.736,131.445 111.15,131.47 117.119,131.966 91.262,132.194 104.978,132.271 100.736,132.448 111.15,132.474
  other v3: 104.546,14.757 110.033,14.757 95.174,14.783 99.974,14.783 85.242,40.259 93.523,40.31 99.771,40.31 105.537,40.31 81.153,40.335
I2C1_SCL: R35.2 R36.2 R38.1 R56.1 U6.42 | length 137
  Top Layer w0.254: R56.1 33.623,108.433 v1@35.458,108.433 ; R38.1 v1(53.391,108.458) ; U6.42 72.214,28.653 76.632,33.071 76.632,88.214 v1(74.727,90.119) 74.727,90.306 R35.2 ; v1(71.679,108.458) 76.556,108.458 v1(76.556,108.483) ; 73.228,108.458 73.241,108.445 R36.2
  Signal Layer 2 w0.254: v1(74.727,90.119) 76.556,91.948 v1(76.556,108.483)
  Bottom Layer w0.254: v1(35.458,108.458) v1(53.391,108.458) v1(71.679,108.458)
I2C1_SDA: R34.2 R37.2 R39.1 R57.1 U6.43 U16.2 | length 137.8
  Top Layer w0.254: U16.2 34.104,104.462 35.128,105.486 35.128,106.646 R57.1 35.501,107.51 v1(35.467,107.544) ; R39.1 56.151,107.51 v1(56.185,107.544) ; U6.43 71.723,29.153 75.463,32.893 75.463,87.816 v1(73.008,90.272) R34.2 ; R37.2 74.948,107.569 v1(75.794,107.569)
  Signal Layer 2 w0.254: v1(73.008,90.272) 73.076,90.204 75.794,92.922 v1(75.794,107.569)
  Bottom Layer w0.254: v1(35.467,107.544) v1(56.185,107.544) 75.794,107.544 v1(75.794,107.569)
NetC11_1: C11.1 L2.2 U3.6 | length 7.6
  Top Layer w0.635: L2.2@102.681,27.468 C11.1 103.078,21.981 U3.6
NetC11_2: C11.2 U3.1 | length 2.7
  Top Layer w0.635: U3.1 100.478,21.574 C11.2
NetC41_1: C41.1 R30.2 U10.10 | length 3.8
  Top Layer w0.279: U10.10 77.006,99.338 C41.1 77.178,99.561 R30.2
NetC41_2: C41.2 R31.2 U10.9 | length 5.8
  Top Layer w0.279: U10.9 74.642,98.205 74.981,97.866 76.934,97.866 C41.2 77.203,96.346 R31.2
NetC45_1: C45.1 R42.1 U11.10 | length 4
  Top Layer w0.254: U11.10 55.423,99.455 C45.1 57.48,99.481 R42.1
NetC45_2: C45.2 R43.1 U11.9 | length 5.5
  Top Layer w0.254: U11.9 54.881,98.281 55.262,97.9 57.506,97.9 57.506,96.36 R43.1
NetC65_1: C65.1 R51.1 U16.10 | length 4
  Top Layer w0.254: U16.10 34.65,99.267 C65.1 ; C65.1@36.81,99.318 R51.1
NetC65_2: C65.2 R52.1 U16.9 | length 5.5
  Top Layer w0.254: U16.9 34.104,98.477 34.918,97.663 36.556,97.663 C65.2 R52.1
NetCN4_1: CN4.1 R16.2 | length 5.9
  Top Layer w0.254: R16.2 36.94,5.004 CN4.1
NetCN4_2: CN4.2 R14.2 | length 5.5
  Top Layer w0.254: CN4.2 41.041,8.182 R14.2
NetD2_2: D2.2 D7.1 U1.2
NetD3_1: D3.1 L1.1 U2.3 U2.4
NetLED1_1: LED1.1 R9.1 | length 2.2
  Top Layer w0.762: LED1.1 60.782,8.738 R9.1@60.858,8.661
NetLED2_1: LED2.1 R10.1 | length 2
  Top Layer w0.762: LED2.1 R10.1@60.682,11.124
NetLED_h1_2: LED_h1.2 R23.1 | length 1.9
  Top Layer w0.381: LED_h1.2 90.873,107.539 R23.1
NetLED_h2_2: LED_h2.2 R24.1 | length 1.8
  Top Layer w0.381: R24.1 70.197,107.523 LED_h2.2
NetLED_h3_2: LED_h3.2 R59.1 | length 1.8
  Top Layer w0.381: R59.1 50.13,105.782 LED_h3.2
NetP1_1: P1.1 P11.2 | length 16.2
  Bottom Layer w0.254: P11.2 95.756,8.46 96.698,7.519 P1.1
NetP11_1: P11.1 P21.1 | length 7.1
  Bottom Layer w0.254: P21.1 83.718,6.282 83.718,9.718 P11.1
NetP11_3: P11.3 P21.3 | length 7.1
  Bottom Layer w0.254: P21.3 81.19,6.27 81.19,9.73 P11.3
NetP11_4: P11.4 P21.4 | length 7.1
  Top Layer w0.254: P21.4 82.452,2.46 81.178,3.734 81.178,7.178 P11.4
NetP11_5: P11.5 P21.5 | length 7.1
  Bottom Layer w0.254: P21.5 78.65,6.27 78.65,9.73 P11.5
NetP11_6: P11.6 P21.6 | length 7.1
  Top Layer w0.254: P21.6 78.65,3.73 78.65,7.19 P11.6
NetP11_7: P11.7 P21.7 | length 7.1
  Bottom Layer w0.254: P21.7 76.098,6.282 76.098,9.718 P11.7
NetP11_8: P11.8 P21.8 | length 7.1
  Top Layer w0.254: P21.8 76.11,3.73 76.11,7.19 P11.8
NetP11_9: P11.9 R32.1 | length 18.6
  Top Layer w0.254: R32.1 62.509,15.062 65.303,12.268 73.572,12.268 P11.9
NetP11_10: P11.10 P21.10 | length 7
  Top Layer w0.254: P21.10 73.584,3.716 73.584,7.204 P11.10
NetP11_11: P11.11 R33.1 | length 17.7
  Top Layer w0.254: R33.1 60.985,15.011 64.997,11 P11.11
NetP11_12: P11.12 P21.12 | length 7.1
  Top Layer w0.254: P21.12 72.14,2.46 71.03,3.57 71.03,7.19 P11.12
NetP20_11: P20.11 P20.12 U1.1 | length 2.5
  Top Layer w1.524: P20.11 P20.12
NetQ2_1: Q2.1 Q2.2 Q2.3 R27.1 R29.2 R30.1 | length 4
  Top Layer w0.279: R30.1 80.21,102.738 R29.2@80.886,102.062
NetQ2_4: Q2.4 R25.2 R27.2 | length 4.1
  Top Layer w0.381: Q2.4 86.135,107.557 R25.2
NetQ4_1: Q4.1 Q4.2 Q4.3 R42.2 R44.1 R46.2 | length 3.3
  Top Layer w0.381: R42.2 60.301,102.785 R46.2
NetQ4_4: Q4.4 R26.2 R44.2 | length 3.9
  Top Layer w0.381: Q4.4 63.833,107.608 R44.2 64.008,107.433 R26.2
NetQ5_1: Q5.1 Q5.2 Q5.3 R50.1 R51.2 R53.2 | length 3.2
  Top Layer w0.254: R51.2 39.865,102.622 R53.2
NetQ5_4: Q5.4 R50.2 R60.2 | length 4.1
  Top Layer w0.381: Q5.4 45.474,107.528 R60.2 ; R50.2 R50.2@43.642,107.353
NetR1_1: R1.1 R2.2 U2.8 | length 5.1
  Top Layer w0.381: R1.1 105.957,94.87 107.772,94.87 U2.8
NetR3_1: R3.1 R4.2 U2.1 | length 5
  Top Layer w0.381: U2.1 107.772,102.895 108.619,102.048 R3.1 R4.2
NetR5_1: R5.1 U3.4 | length 3.5
  Top Layer w0.635: U3.4 103.078,17.217 103.522,16.773 R5.1
NetR6_1: R6.1 R7.2 U3.3 | length 4.7
  Top Layer w0.254: R6.1 98.4,18.483 98.757,18.125 U3.3
NetR12_2: R12.2 U8.1 | length 10.2
  Top Layer w0.254: R12.2 37.948,114.325 40.27,116.648 U8.1
NetR17_1: R17.1 U8.16 | length 3.9
  Top Layer w0.254: R17.1 35.306,115.9 36.054,116.648 U8.16
NetR18_1: R18.1 U8.15 | length 3.6
  Top Layer w0.254: R18.1 33.9,117.298 U8.15
NetR19_2: R19.2 R21.2 U13.3 | length 4
  Top Layer w0.381: R19.2 90.891,97.123 U13.3
NetR20_2: R20.2 R22.2 U14.3 | length 4.1
  Top Layer w0.381: R20.2 70.197,97.104 R22.2 70.444,98.977 U14.3
NetR23_2: R23.2 R25.1 U13.5 | length 5.2
  Top Layer w0.381: R25.1 89.205,105.876 88.991,105.662 U13.5
NetR24_2: R24.2 R26.1 U14.5 | length 5.1
  Top Layer w0.381: R26.1 65.896,105.74 R24.2 68.544,105.594 U14.5
NetR36_1: R36.1 U10.5 | length 2.5
  Top Layer w0.279: U10.5 73.143,105.883 R36.1
NetR37_1: R37.1 U10.4 | length 2.9
  Top Layer w0.279: U10.4 73.642,104.732 74.867,105.956 R37.1
NetR38_2: R38.2 U11.5 | length 2.4
  Top Layer w0.254: U11.5 53.381,105.993 R38.2
NetR39_2: R39.2 U11.4 | length 2.8
  Top Layer w0.254: U11.4 53.881,104.842 R39.2
NetR56_2: R56.2 U16.5 | length 2.5
  Top Layer w0.254: U16.5 32.604,105.907 R56.2
NetR57_2: R57.2 U16.4 | length 3
  Top Layer w0.254: U16.4 33.104,104.842 R57.2
NetR59_2: R59.2 R60.1 U15.5 | length 4.9
  Top Layer w0.381: R60.1 47.998,105.923 48.442,105.923 R59.2 ; U15.5@48.381,103.709 R59.2@48.381,105.54
NetR61_2: R61.2 R62.2 U15.3 | length 4.1
  Top Layer w0.381: R62.2 50.281,97.147 U15.3@50.281,101.109
NetR69_1: R69.1 R70.2 U10.8 | length 4.7
  Top Layer w0.279: R70.2 74.143,96.384 U10.8
  Top Layer w0.381: R70.2 75.565,96.283 R69.1
NetR71_1: R71.1 R72.2 U11.8 | length 4.8
  Top Layer w0.254: R71.1 R71.1@54.207,96.291 ; U11.8 54.381,96.465 R71.1@54.207,96.291 ; R72.2 R71.1@54.207,96.291
NetR73_1: R73.1 R74.2 U16.8 | length 5.3
  Top Layer w0.254: R74.2 R74.2@33.411,96.243 ; U16.8 33.604,98.331 34.232,97.703 34.232,97.064 R74.2@33.411,96.243 ; R73.1 R74.2@33.411,96.243
NTC1: P30.15 R15.1 U8.11 | length 64.1
  Top Layer w0.254: U8.11 39.329,119.898 41.326,121.895 46.567,121.895 47.315,121.147 47.315,121.097 47.508,120.904 85.725,120.904 88.544,123.723 91.872,123.723 92.431,124.282 92.431,126.009 92.913,126.492 94.728,126.492 P30.15
NTC2: P30.17 R13.1 U8.7 | length 55
  Top Layer w0.254: U8.7 45.932,120.548 R13.1 46.567,119.998 47.414,119.151 89.992,119.151 92.431,121.59 92.431,123.19 93.68,124.439 P30.17
NTC3: P30.19 R48.1 U8.10 | length 56.4
  Top Layer w0.254: U8.10 38.684,120.548 41.554,123.419 R48.1 46.567,123.41 47.447,122.53 84.176,122.53 86.646,125 P30.19
OSCIN: C19.2 R11.2 U6.5 X1.3 | length 10.9
  Top Layer w0.254: U6.5 62.249,35.071 64.01,36.832 64.01,38.279 X1.3 64.42,40.346 C19.2 ; R11.2 63.934,37.059
OSCOUT: C20.2 R11.1 U6.6 X1.1 | length 12.8
  Top Layer w0.254: 60.249,37.059 R11.1 ; C20.2@61.352,43.688 61.352,41.438 X1.1 60.223,40.05 60.223,36.601 61.749,35.076 U6.6
PB10: U6.21 U8.14 | length 142.1
  Top Layer w0.254: U8.14 34.96,117.948 34.646,118.262 26.213,118.262 16.078,108.128 16.078,36.322 24.747,27.653 U6.21
PB12: R10.2 U6.25 | length 15
  Top Layer w0.279: U6.25 58.749,15.673 62.209,12.213 R10.2
RESET: C22.1 R8.1 SW1.2 U6.7 | length 14.7
  Top Layer w0.254: SW1.2 56.353,37.008 C22.1 v1@56.585,33.947 ; v1@56.585,33.941 v1(56.591,33.947) ; v1(58.953,31.445) 60.706,31.445 61.249,31.989 U6.7
  Bottom Layer w0.254: v1(56.591,33.947) 56.591,32.512 57.658,31.445 v1(58.953,31.445)
SPI1_MISO: R18.2 U6.16 | length 131.7
  Top Layer w0.254: v1(27.838,117.475) R18.2 ; v1(27.864,115.037) 26.162,115.037 18.11,106.985 18.11,37.313 25.27,30.153 U6.16
  Bottom Layer w0.254: v1(27.864,115.037) 27.864,117.373 v1@27.965,117.475
SPI1_MOSI: R17.2 U6.17 | length 132.3
  Top Layer w0.254: R17.2 25.679,115.9 17.12,107.34 17.12,36.779 24.246,29.653 U6.17
SPI1_SCK: R12.1 U6.15 | length 112.9
  Top Layer w0.254: R12.1 30.658,114.325 29.261,112.928 29.261,32.258 30.866,30.653 U6.15
SWCLK: CN2.4 U6.37 | length 25.4
  Top Layer w0.254: v1@65.749,13.259 U6.37
  Bottom Layer w0.254: CN2.4@62.526,3.404 64.745,3.404 65.735,4.394 v1(65.735,13.259)
SWDIO: CN2.3 U6.34 | length 25.1
  Top Layer w0.254: U6.34 63.249,22.78 63.373,22.657 63.373,16.51 64.541,15.342 v1(64.541,14.427)
  Bottom Layer w0.254: CN2.3 60.026,5.187 60.909,6.071 63.373,6.071 64.541,7.239 v1(64.541,14.427)
TIM1_CH4: R20.1 U6.32 | length 82.8
  Top Layer w0.254: U6.32 62.249,29.636 65.888,33.274 71.247,33.274 74.193,36.22 74.193,85.09 68.716,90.568 R20.1
TIM2_CH4: R19.1 U6.22 | length 92.6
  Top Layer w0.254: U6.22 v1(61.036,27.153) ; v1(67.945,27.407) 73.457,27.407 77.673,31.623 77.673,85.412 R19.1
  Bottom Layer w0.254: v1(61.036,27.153) 67.691,27.153 v1(67.945,27.407)
TIM3_CH4: R62.1 U6.19 | length 81.8
  Top Layer w0.254: v1(45.263,28.651) 45.265,28.653 U6.19 ; v1@45.314,34.049 45.314,35.839 45.314,93.686 R62.1
  Bottom Layer w0.254: v1(45.263,28.651) 45.314,28.702 v1@45.314,34.049
  other v1: 45.314,34.011
USART1_RX: R32.2 U6.31 | length 3.8
  Top Layer w0.254: U6.31 61.749,21.961 R32.2
USART1_TX: R33.2 U6.30 | length 3.6
  Top Layer w0.254: R33.2 61.249,21.464 U6.30
USART2_RX: R14.1 U6.13 | length 40.2
  Top Layer w0.254: R14.1@40,8.687 v1(40,26.635) ; v1@40.03,31.653 U6.13
  Bottom Layer w0.254: v1(40,26.635) 40.03,26.665 v1(40.03,31.699)
USART2_TX: R16.1 U6.12 | length 44.6
  Top Layer w0.254: R16.1@38.456,8.859 v1(38.456,26.543) ; v1(38.481,33.071) 38.481,33.02 38.494,33.033 58.629,33.033 U6.12
  Bottom Layer w0.254: v1(38.456,26.543) 38.481,26.568 v1(38.481,33.071)
VCC_3.3V: P10.1 P10.2 P20.1 P20.2 | length 8.5
  Top Layer w1.524: P10.1 P10.2 P20.1 P20.2
VCC_5V: P10.5 P10.6 P20.5 P20.6 | length 8.5
  Top Layer w1.524: P10.5 P10.6 P20.5 P20.6
pads on no net: P10.11 P10.12 P21.2 P21.9 P21.11 P30.1 P30.2 SW1.1 SW1.3 U2.6 U2.7 U6.2 U6.3 U6.4 U6.10 U6.11 U6.14 U6.18 U6.20 U6.26 U6.27 U6.28 U6.29 U6.33 U6.38 U6.39 U6.40 U6.41 U6.45 U6.46 U8.6 U8.8 U8.9 U10.3 U11.3 U12.4 U16.3
copper on no net:
  other v1: 57.912,37.948 57.912,40.996

## Polygon pours and split planes (outlines as drawn)
GND on Signal Layer 1 "Top Layer-No Net" (solid, remove dead copper, pour order 7): 117.983,0.965 118.745,0.965 126.111,8.331 126.289,8.509 126.289,31.064 126.289,34.011 125.73,34.569 121.056,34.569 120.625,34.569 120.091,35.103 120.142,35.154 120.142,41.631 120.142,47.803 118.339,49.606 113.081,49.606 112.827,49.606 112.116,50.317 112.116,57.76 112.116,107.112 113.386,108.382 113.69,108.687 118.847,108.687 119.913,109.753 120.04,109.88 120.04,132.41 120.04,132.588 119.634,132.994 119.55,133.078 107.569,133.078 16.568,133.078 14.656,131.166 14.351,130.861 14.351,104.953 14.351,10.16 16.231,8.28 16.307,8.357 30.505,8.357 32.055,6.807 32.106,6.756 32.106,2.337 33.223,1.219
+3.3V on Signal Layer 2 "Top Layer-No Net" (solid, remove dead copper, pour order 9): 84.938,35.509 84.938,30.353 84.938,14.834 83.871,13.767 82.855,12.751 68.809,12.751 68.529,12.751 67.589,11.811 65.964,10.185 65.964,2.896 65.964,2.515 64.745,1.295 64.654,1.205 46.99,1.205 46.953,1.168 33.071,1.168 31.242,2.997 31.242,7.036 29.616,8.661 28.575,9.703 22.606,9.703 16.383,9.703 14.859,11.227 14.656,11.43 14.656,20.574 14.656,124.054 15.977,125.374 39.167,125.374 81.737,125.374 84.938,122.174
GND on Top Layer "Top Layer-No Net" (solid, remove dead copper, pour order 4): 57.252,46.203 74.193,46.203 74.193,33.706 74.625,33.274 74.085,33.814 56.585,33.814 56.585,45.79 56.718,45.923

## Keep-outs
Keep-Out Layer:
  circle w0.1: c23.495,86.995 r3
  circle w0.1: c23.495,62.001 r3
  circle w0.1: c96.495,62.001 r3
  circle w0.1: c59.995,71.933 r8
  circle w0.1: c96.495,86.995 r3

## Other copper
Top Layer:
  rectangle net GND: 66.548,102.133 70.333,102.845
  rectangle net GND: 63.424,102.032 67.031,103.454
  rectangle net GND: 63.398,100.355 64.465,103.454
  rectangle net GND: 46.38,102.083 49.682,102.845
  rectangle net GND: 43.332,101.854 46.838,103.53
  rectangle net GND: 88.062,38.887 111.912,42.037
  rectangle net GND: 102.184,36.805 111.989,40.183
  rectangle net GND: 80.061,37.998 91.008,42.062
  rectangle net GND: 94.183,13.767 98.908,17.323
  rectangle net GND: 94.183,13.792 115.087,15.875
  rectangle net GND: 105.842,1.321 107.594,14.681
  rectangle net GND: 110.896,1.346 115.113,14.656
  rectangle net NetP20_11: 116.078,7.239 124.181,9.398
  rectangle net NetP20_11: 116.103,7.341 118.262,11.836
  rectangle net NetD2_2: 120.498,11.633 124.358,17.577
  rectangle net NetD2_2: 115.875,15.342 122.25,18.491
  rectangle net +12V: 114.656,20.053 122.758,28.016
  rectangle net +12V: 114.706,27.026 119.151,39.7
  rectangle net +12V: 104.445,17.805 108.356,21.463
  rectangle net +12V: 107.061,17.856 109.195,23.19
  rectangle net +12V: 107.01,20.053 122.758,23.749
  region net +12V: 109.195,17.856 112.499,21.161 110.596,23.065 107.291,19.76
  rectangle net +5V: 94.336,22.036 98.825,23.317
  rectangle net +5V: 93.955,20.65 96.749,29.362
  rectangle net +5V: 88.544,26.594 96.825,29.845
  rectangle net +5V: 81.058,27.17 89.803,29.788
  rectangle net +5V: 94.742,27.051 97.612,32.868
  rectangle net +5V: 94.742,31.318 106.07,33.426
  rectangle net +5V: 100.485,32.08 106.096,35.55
  region net +5V: 93.447,27.94 96.751,31.245 94.848,33.149 91.543,29.844
  rectangle net +3.3V: 85.192,33.985 99.06,36.373
  rectangle net +3.3V: 81.102,33.985 89.891,35.966
  rectangle net +12V: 100.127,90.805 104.914,96.317
  rectangle net +12V: 100.635,94.31 104.064,98.857
  rectangle net +12V: 98.044,96.571 101.956,99.466
  rectangle net NetD3_1: 103.761,102.952 105.232,108.001
  rectangle net NetD3_1: 97.968,102.684 105.232,105.156
  rectangle net +48V: 99.242,109.83 112.7,113.055
  region net +48V: 99.269,109.912 100.827,111.47 99.242,113.055 97.683,111.497
  rectangle net +48V: 110.261,111.162 112.7,128.346
  rectangle net +48V: 106.07,126.771 114.732,128.956
  rectangle net +48V: 105.486,121.158 107.137,128.956
  rectangle net +12V: 84.099,96.698 87.579,99.949
  rectangle net +12V: 85.801,100.322 89.281,101.402
  rectangle net NetQ2_1: 81.934,105.385 83.337,107.107
  rectangle net NetQ2_1: 82.284,105.407 84.982,106.285
  rectangle net NetQ2_1: 81.984,100.855 83.045,107.057
  region net NetQ2_1: 80.391,101.575 84.353,105.537 83.299,106.591 79.337,102.629
  rectangle net +12V: 63.5,96.774 67.056,99.746
  rectangle net +12V: 65.329,100.193 68.834,101.463
  rectangle net GND: 79.172,93.167 82.652,97.104
  rectangle net GND: 58.979,94.005 62.332,97.282
  rectangle net GND: 38.278,94.082 41.529,97.358
  region net NetQ4_1: 60.969,101.838 64.008,104.877 62.649,106.235 59.61,103.197
  rectangle net NetQ4_1: 61.525,101.448 62.916,107.158
  rectangle net NetQ4_1: 61.761,105.458 64.458,106.335
  rectangle net NetQ4_1: 63.043,104.877 64.008,105.893
  rectangle net NetQ5_1: 42.676,104.797 43.642,105.813
  rectangle net NetQ5_1: 41.394,105.378 44.092,106.256
  rectangle net NetQ5_1: 41.159,101.549 42.549,107.078
  region net NetQ5_1: 40.603,101.758 43.642,104.797 42.283,106.156 39.244,103.117
  rectangle net +12V: 45.136,100.269 48.666,101.397
  rectangle net +12V: 43.256,96.622 46.838,99.822
  rectangle net +48V: 100.127,121.31 102.006,126.721
  rectangle net +48V: 100.071,126.086 101.752,128.729
  rectangle net +48V: 97.104,126.721 101.702,128.905
  rectangle net +48V: 97.231,109.855 99.593,111.912
  region net +48V: 97.196,109.316 98.512,110.632 97.231,111.912 95.915,110.596
  rectangle net +12V: 93.624,96.063 101.397,97.587
  rectangle net GND: 84.049,100.635 85.09,103.708
  rectangle net GND: 84.049,101.778 87.884,103.683
  rectangle net GND: 85.649,102.006 90.5,102.718
  rectangle net GND: 96.19,93.472 98.908,95.275
  rectangle net GND: 105.41,92.608 108.153,93.574
  rectangle net GND: 95.936,105.791 101.422,108.585
  rectangle net GND: 30.429,118.669 32.537,124.231
  rectangle net GND: 90.805,127.432 92.975,132.824
  rectangle net GND: 99.847,129.489 105.562,132.969
  rectangle net GND: 110.434,129.639 111.811,132.842
  rectangle net GND: 116.434,127.356 118.937,132.748
  rectangle net +48V: 109.76,103.276 110.668,110.617
  rectangle net +3.3V: 81.102,32.156 90.729,35.966
  rectangle net +12V: 114.833,39.497 118.72,43.332
  region net +12V: 107.112,48.235 115.367,39.98 118.72,43.332 110.465,51.587
  rectangle net +12V: 107.112,48.235 111.836,86.589
  region net +12V: 100.127,90.805 107.696,83.236 111.049,86.589 103.48,94.158
Bottom Layer:
  rectangle net +48V: 105.308,119.685 107.391,126.009
  rectangle net GND: 105.74,12.802 115.214,15.138
  rectangle net VCC_3.3V: 103.099,1.473 105.131,12.192
  rectangle net GND: 105.791,1.346 107.645,14.554
  rectangle net VCC_5V: 108.306,1.321 110.109,12.116
  rectangle net GND: 110.896,1.194 115.164,14.554
  rectangle net NetP20_11: 116.027,7.544 118.13,12.116
  rectangle net +48V: 100.228,119.685 102.311,126.009
  rectangle net +48V: 110.439,119.609 112.547,126.162
  rectangle net +48V: 100.254,119.405 112.547,121.26
  rectangle net +12V: 43.485,96.139 94.412,97.561

## Silkscreen, mask and mechanical layers (free items; w line width, h text height)
Top Overlay:
  lines w0.1: 46.965,88.875 46.965,93.777 47.142,93.955 47.396,93.955 47.447,94.005 47.447,96.266 47.447,103.226 47.904,103.683 47.93,103.683 ; 50.47,10.592 54.407,10.592 55.143,10.592 56.49,9.246 ; 65.303,87.249 65.303,92.634 67.64,94.971 67.64,103.403 67.945,103.708 68.021,103.708 ; 71.018,94.234 71.018,94.209 71.628,93.599 77.749,93.599 78.232,94.082 ; 76.251,93.574 76.251,86.137 76.747,85.641 ; 97.358,23.165 97.358,10.465 97.384,10.439 ; 99.593,12.675 99.593,20.472 99.873,20.752 99.873,23.292
  text "DROP CONTROL BDNO2 V1.0" at 28.88,130.023 h1.8
  text "GND" at 4.648,5.232 h1.8
  text "+5V" at 90.145,3.454 h1.8 r90
Mechanical 1:
  circle w0.1: c60,71.933 r6.5
  circle w0.1: c23.5,86.995 r1.65
  circle w0.1: c23.5,62.001 r1.65
  circle w0.1: c96.5,86.995 r1.65
  circle w0.1: c96.5,62.001 r1.65
  circle w0.1: c96.5,87.012 r1.65
  circle w0.1: c60,71.95 r6.5
  lines w0.1: -8,25.933 -1,25.933 -1,11.933 -8,11.933 -8,8 0,0 15.773,0 15.773,7 29.773,7 29.773,0 120,0 ; -8,25.933 -8,36.4 -1,36.4 -1,51.9 7,51.9 7,107.2 -1,107.2 -1,124.2 -8,124.2 -8,125.5 0,133.5 120,133.5 128,125.5 128,124.2 121,124.2 121,107.2 113,107.2 113,51.9 121,51.9 121,36.4 128,36.4 128,8 120,0 ; -8,25.933 -8,25.933 ; 120,0 120,0

## Text inside footprints (layer, text, board x,y; h text height)
P10: Top Overlay "2" at 101.62,4.532 h1.6; Top Overlay "1" at 101.62,1.992 h1.6; Top Overlay "11" at 118.511,1.992 h1.6; Top Overlay "12" at 118.511,4.532 h1.6
P11: Top Overlay "2" at 87.54,8.968 h1.6 r180; Top Overlay "1" at 87.54,11.508 h1.6 r180; Top Overlay "11" at 70.649,11.508 h1.6 r180; Top Overlay "12" at 70.649,8.968 h1.6 r180
P20: Top Overlay "2" at 101.62,10.532 h1.6; Top Overlay "1" at 101.62,7.992 h1.6; Top Overlay "11" at 118.511,7.992 h1.6; Top Overlay "12" at 118.511,10.532 h1.6
P21: Top Overlay "2" at 87.54,2.968 h1.6 r180; Top Overlay "1" at 87.54,5.508 h1.6 r180; Top Overlay "11" at 70.649,5.508 h1.6 r180; Top Overlay "12" at 70.649,2.968 h1.6 r180
P30: Top Overlay "2" at 116.54,122.968 h1.6 r180; Top Overlay "1" at 116.54,125.508 h1.6 r180; Top Overlay "16" at 94.188,122.714 h1.02 r180; Top Overlay "15" at 94.188,125.762 h1.02 r180; Top Overlay "19" at 89.489,125.508 h1.6 r180; Top Overlay "20" at 89.362,122.968 h1.6 r180